# Altium PCB CarnLog-26.PcbDoc (part 1 of 4)
Units mm, origin at the board's own origin, x right, y up, seen from the top; angles counter-clockwise.
Board outline 109.83 x 61.93 mm, 6 copper layers (Sig/Pwr/Gnd-1, Gnd-2, Sig/Pwr/Gnd-3, Sig/Pwr/Gnd-4, Gnd-5, Sig/Pwr-6), stack 1.491 mm thick; 183 components, 128 nets, 802 pads, 490 vias.
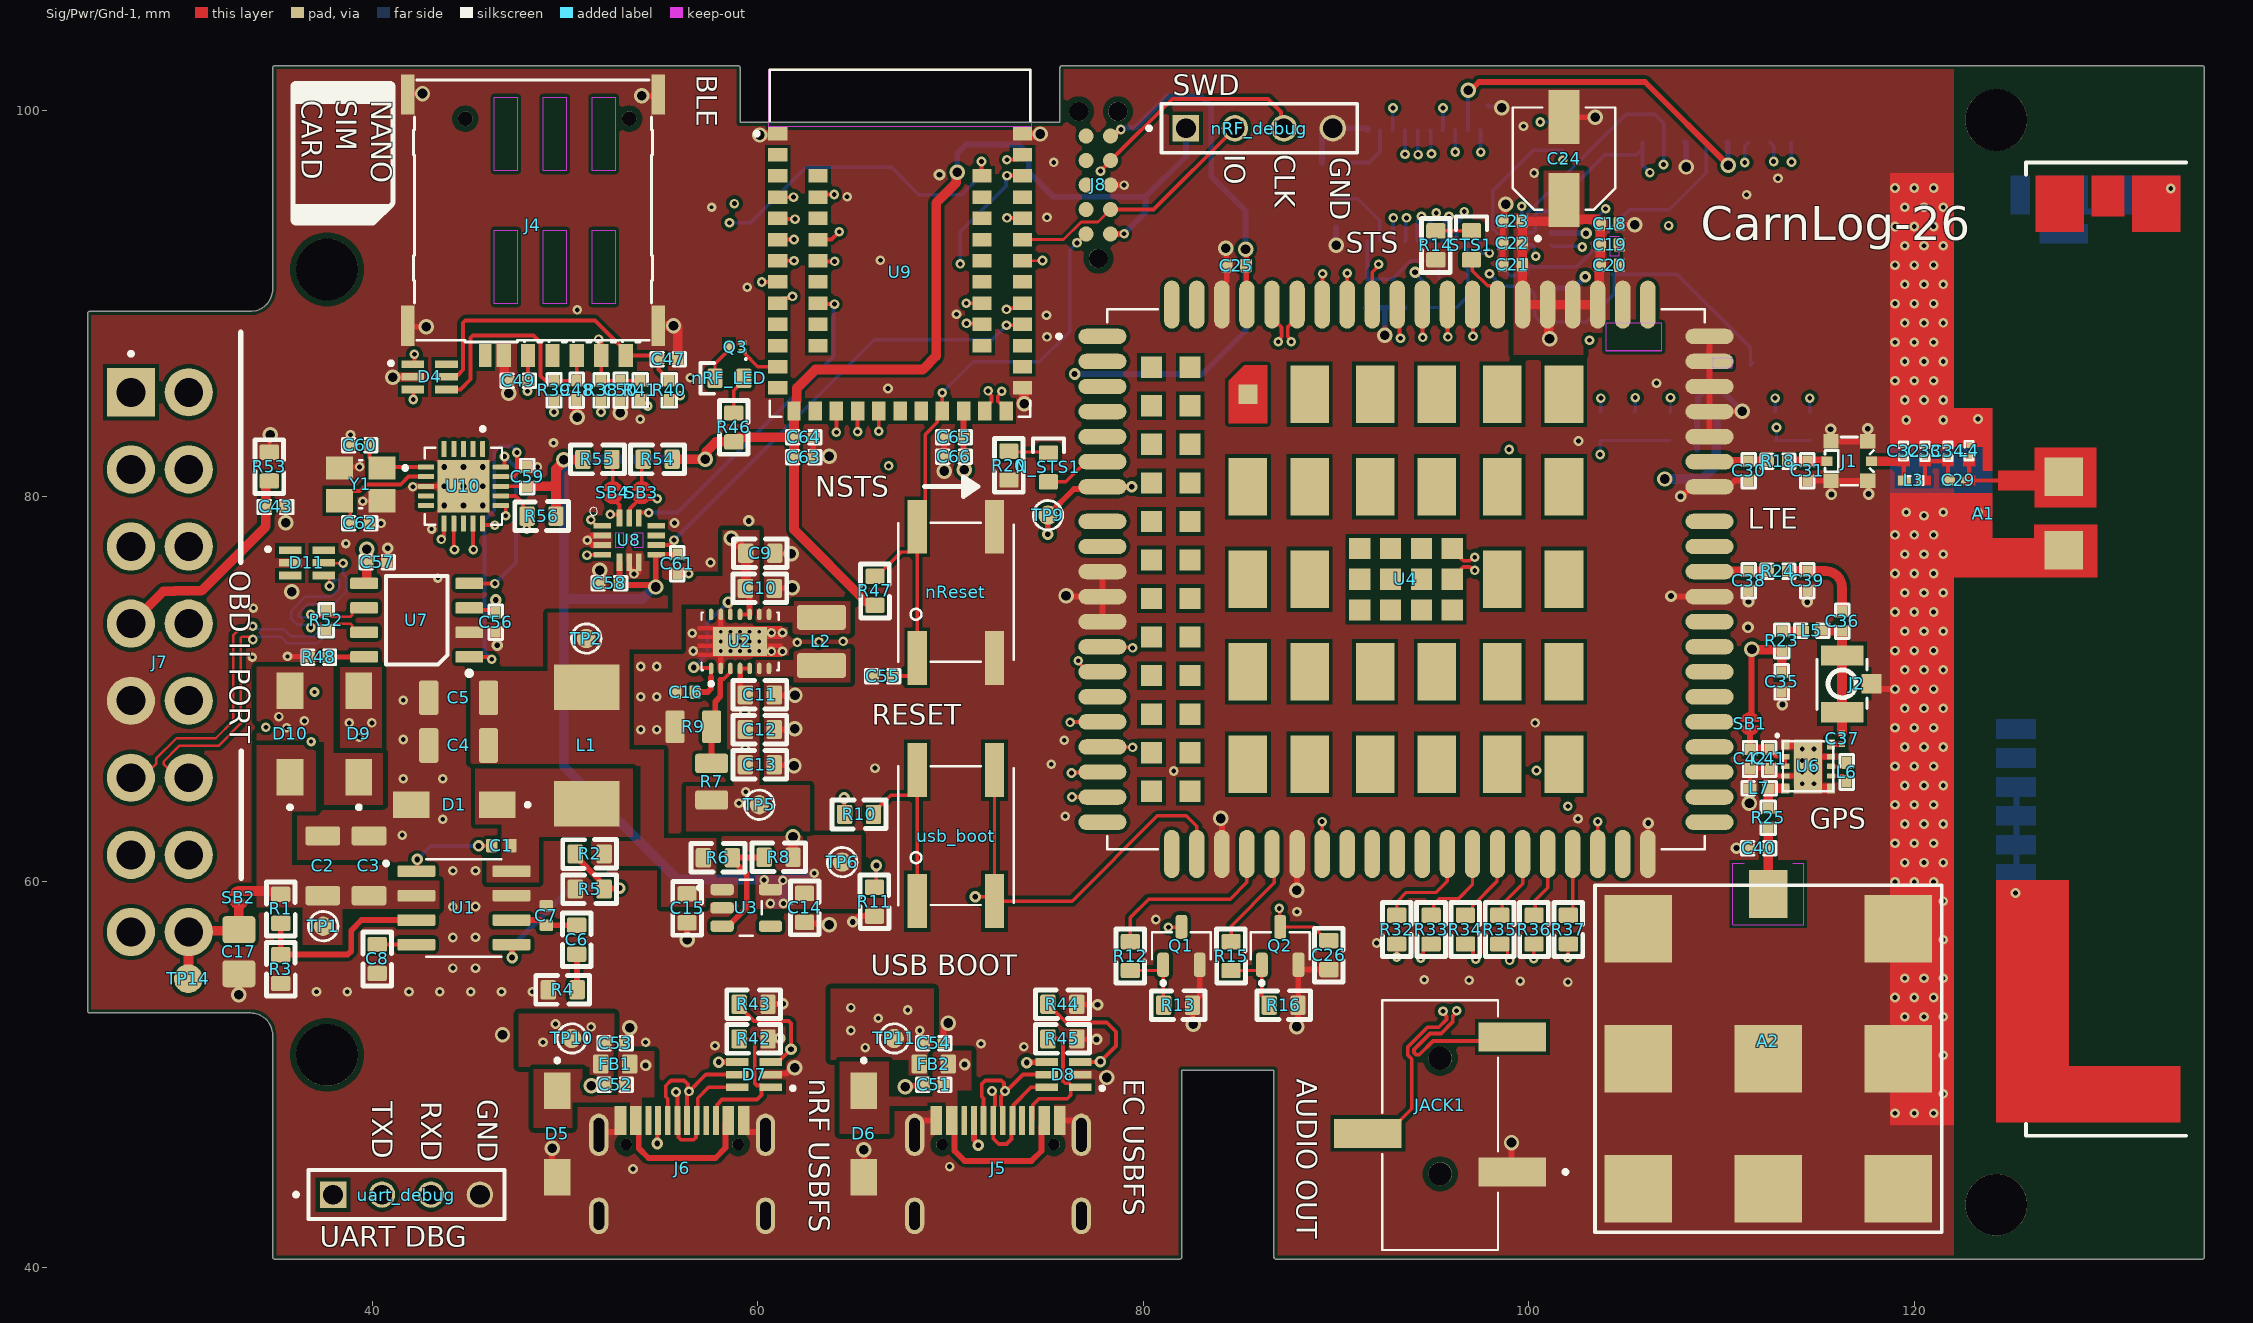
[diagram p0: Sig/Pwr/Gnd-1 view]
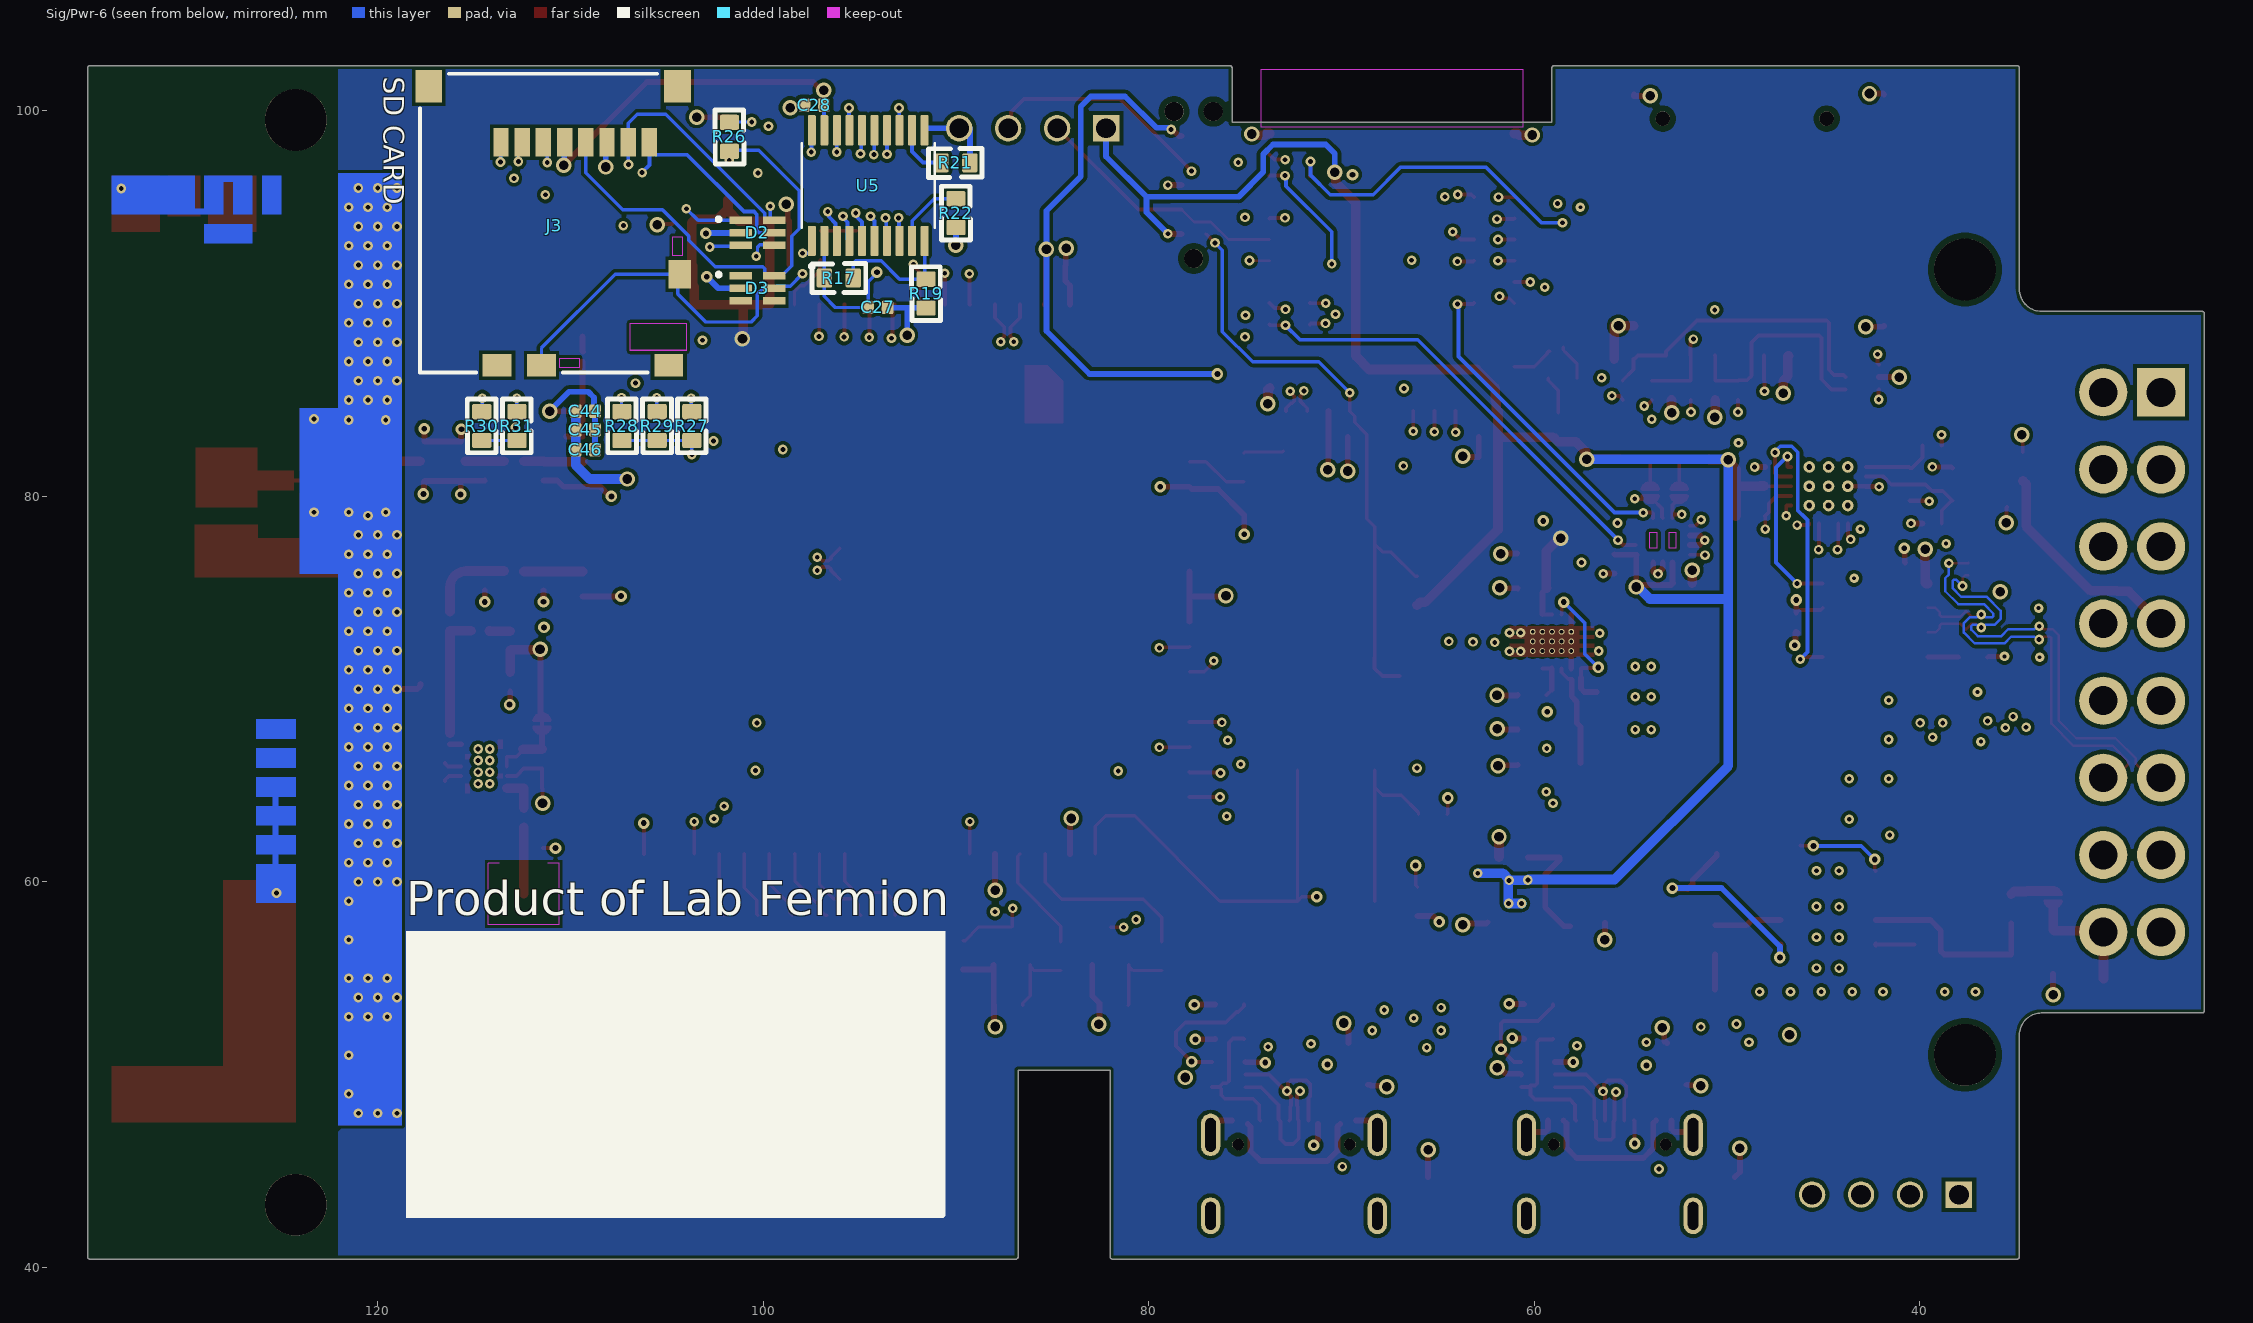
[diagram p1: Sig/Pwr-6 view, seen from below]
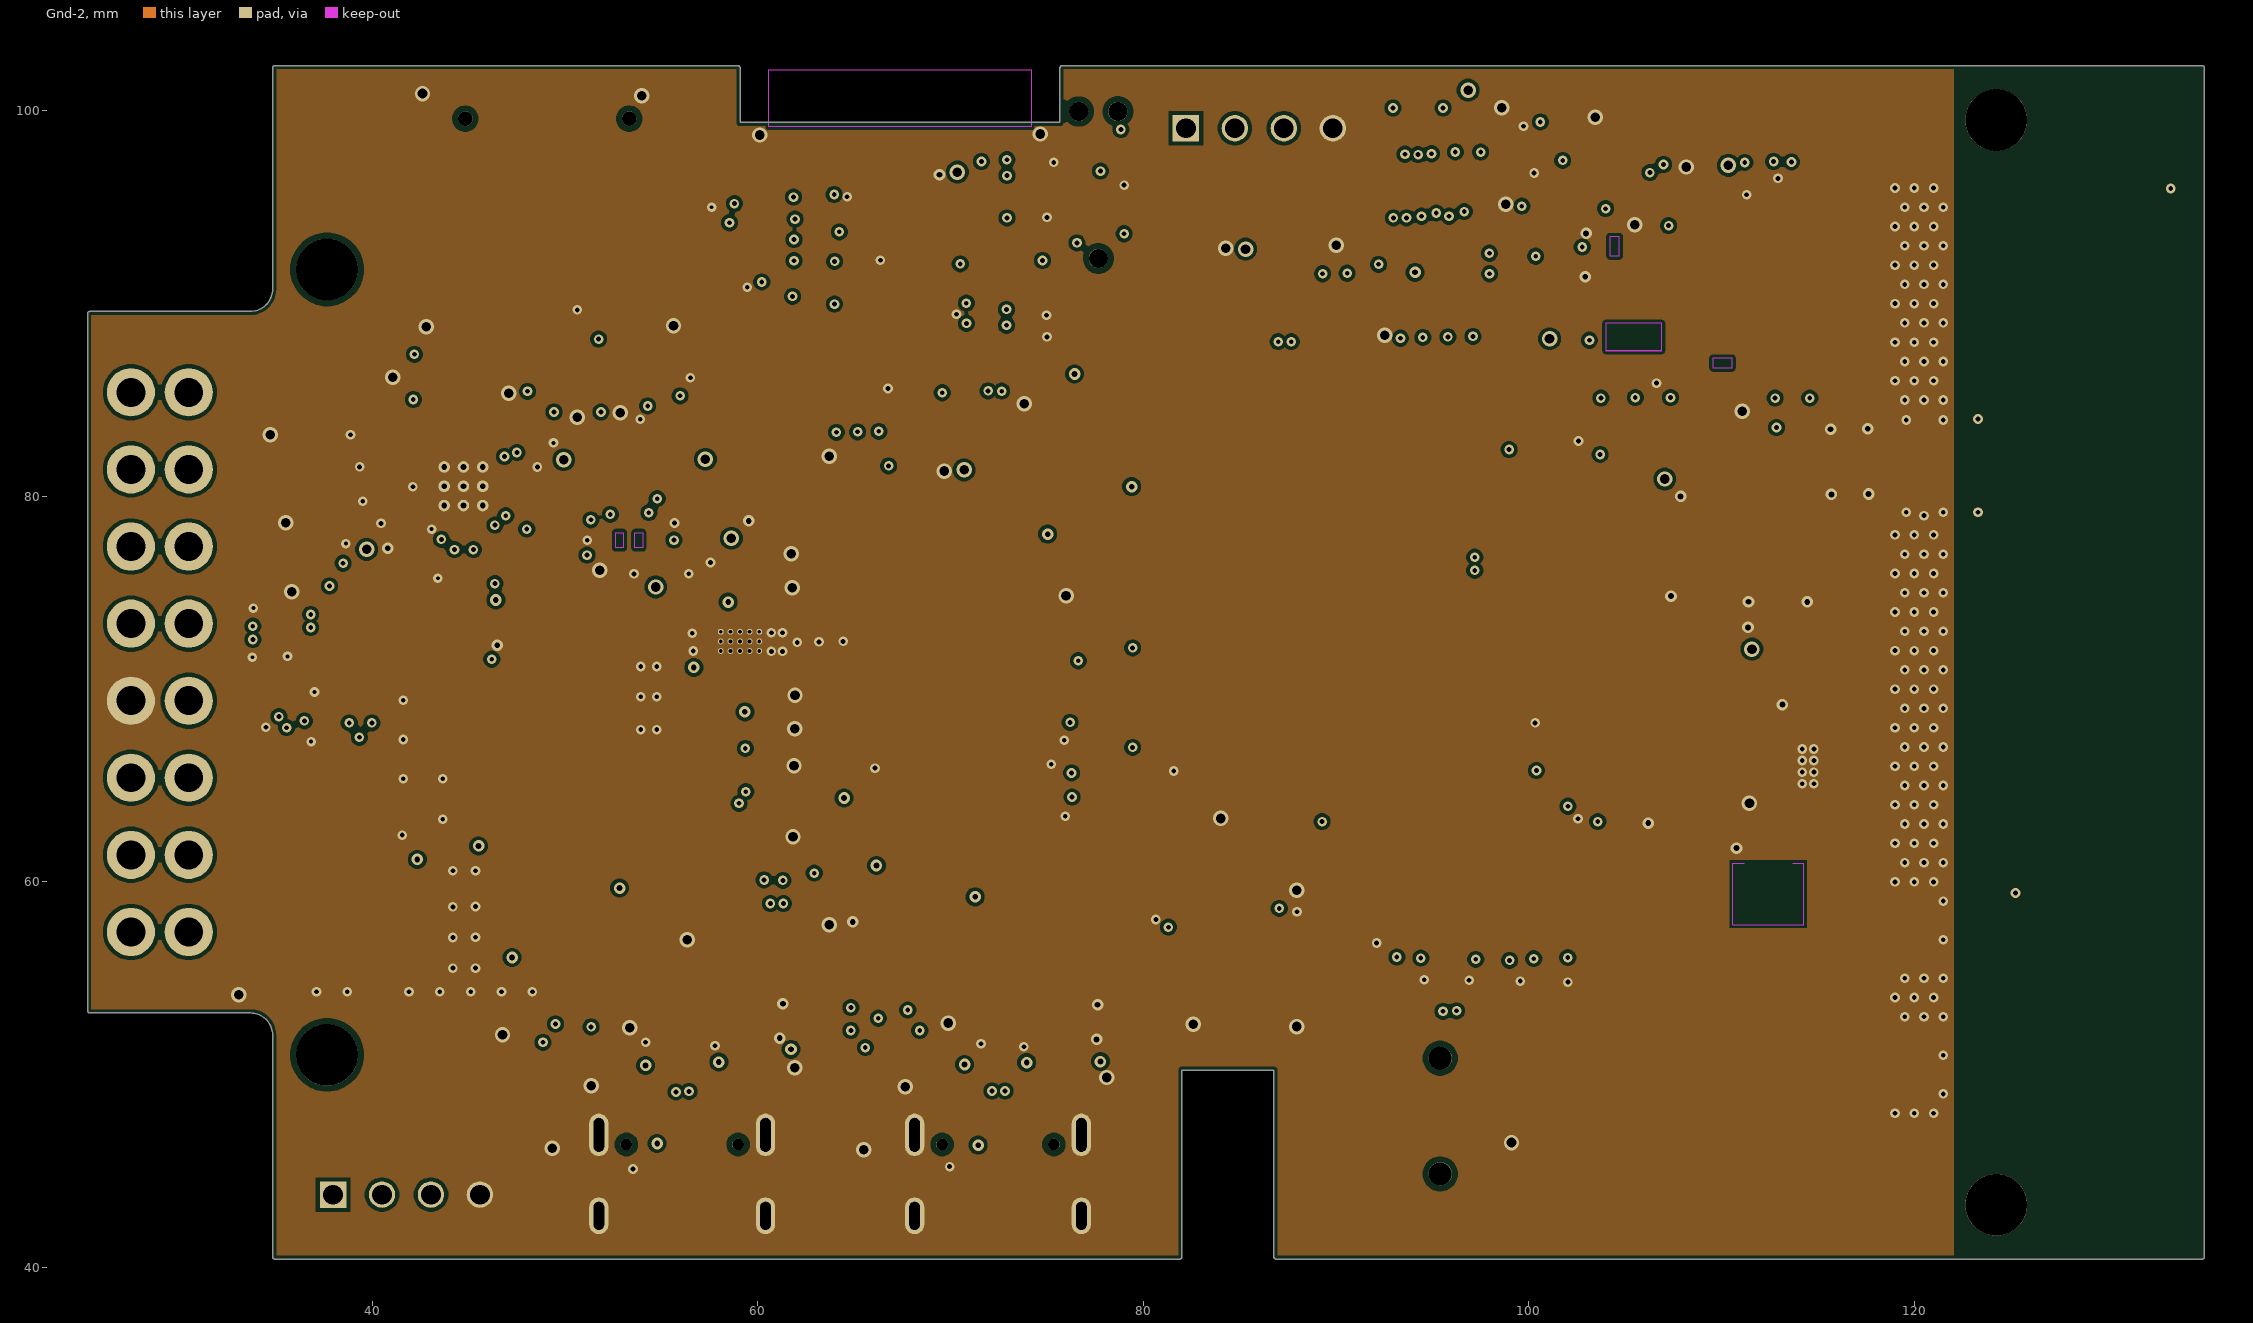
[diagram p2: Gnd-2]
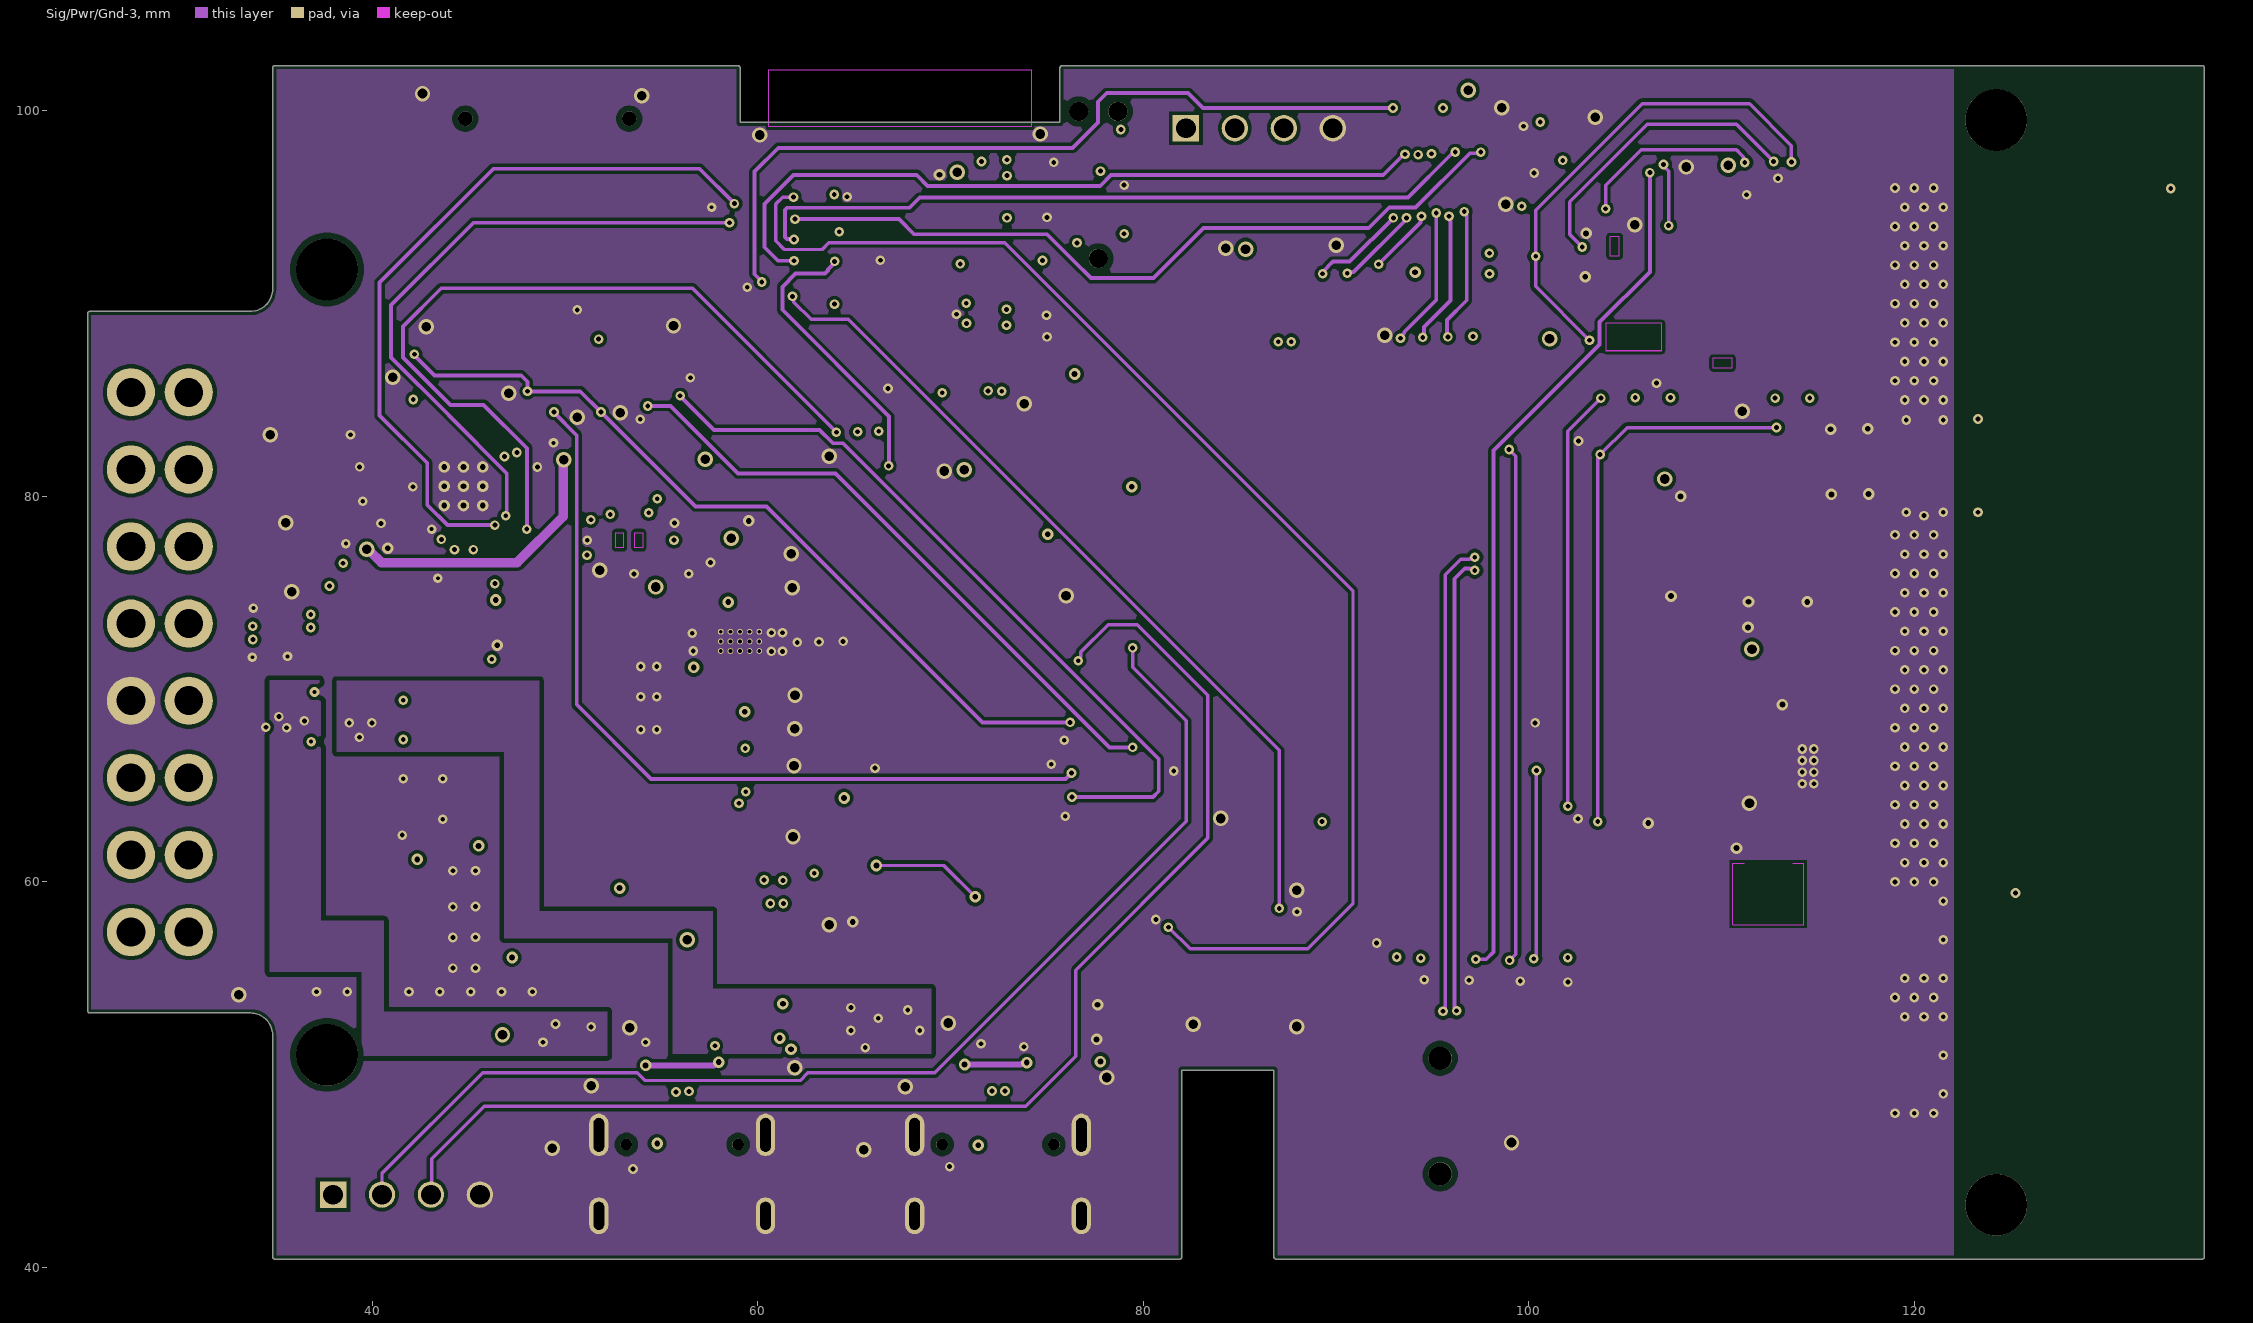
[diagram p3: Sig/Pwr/Gnd-3]
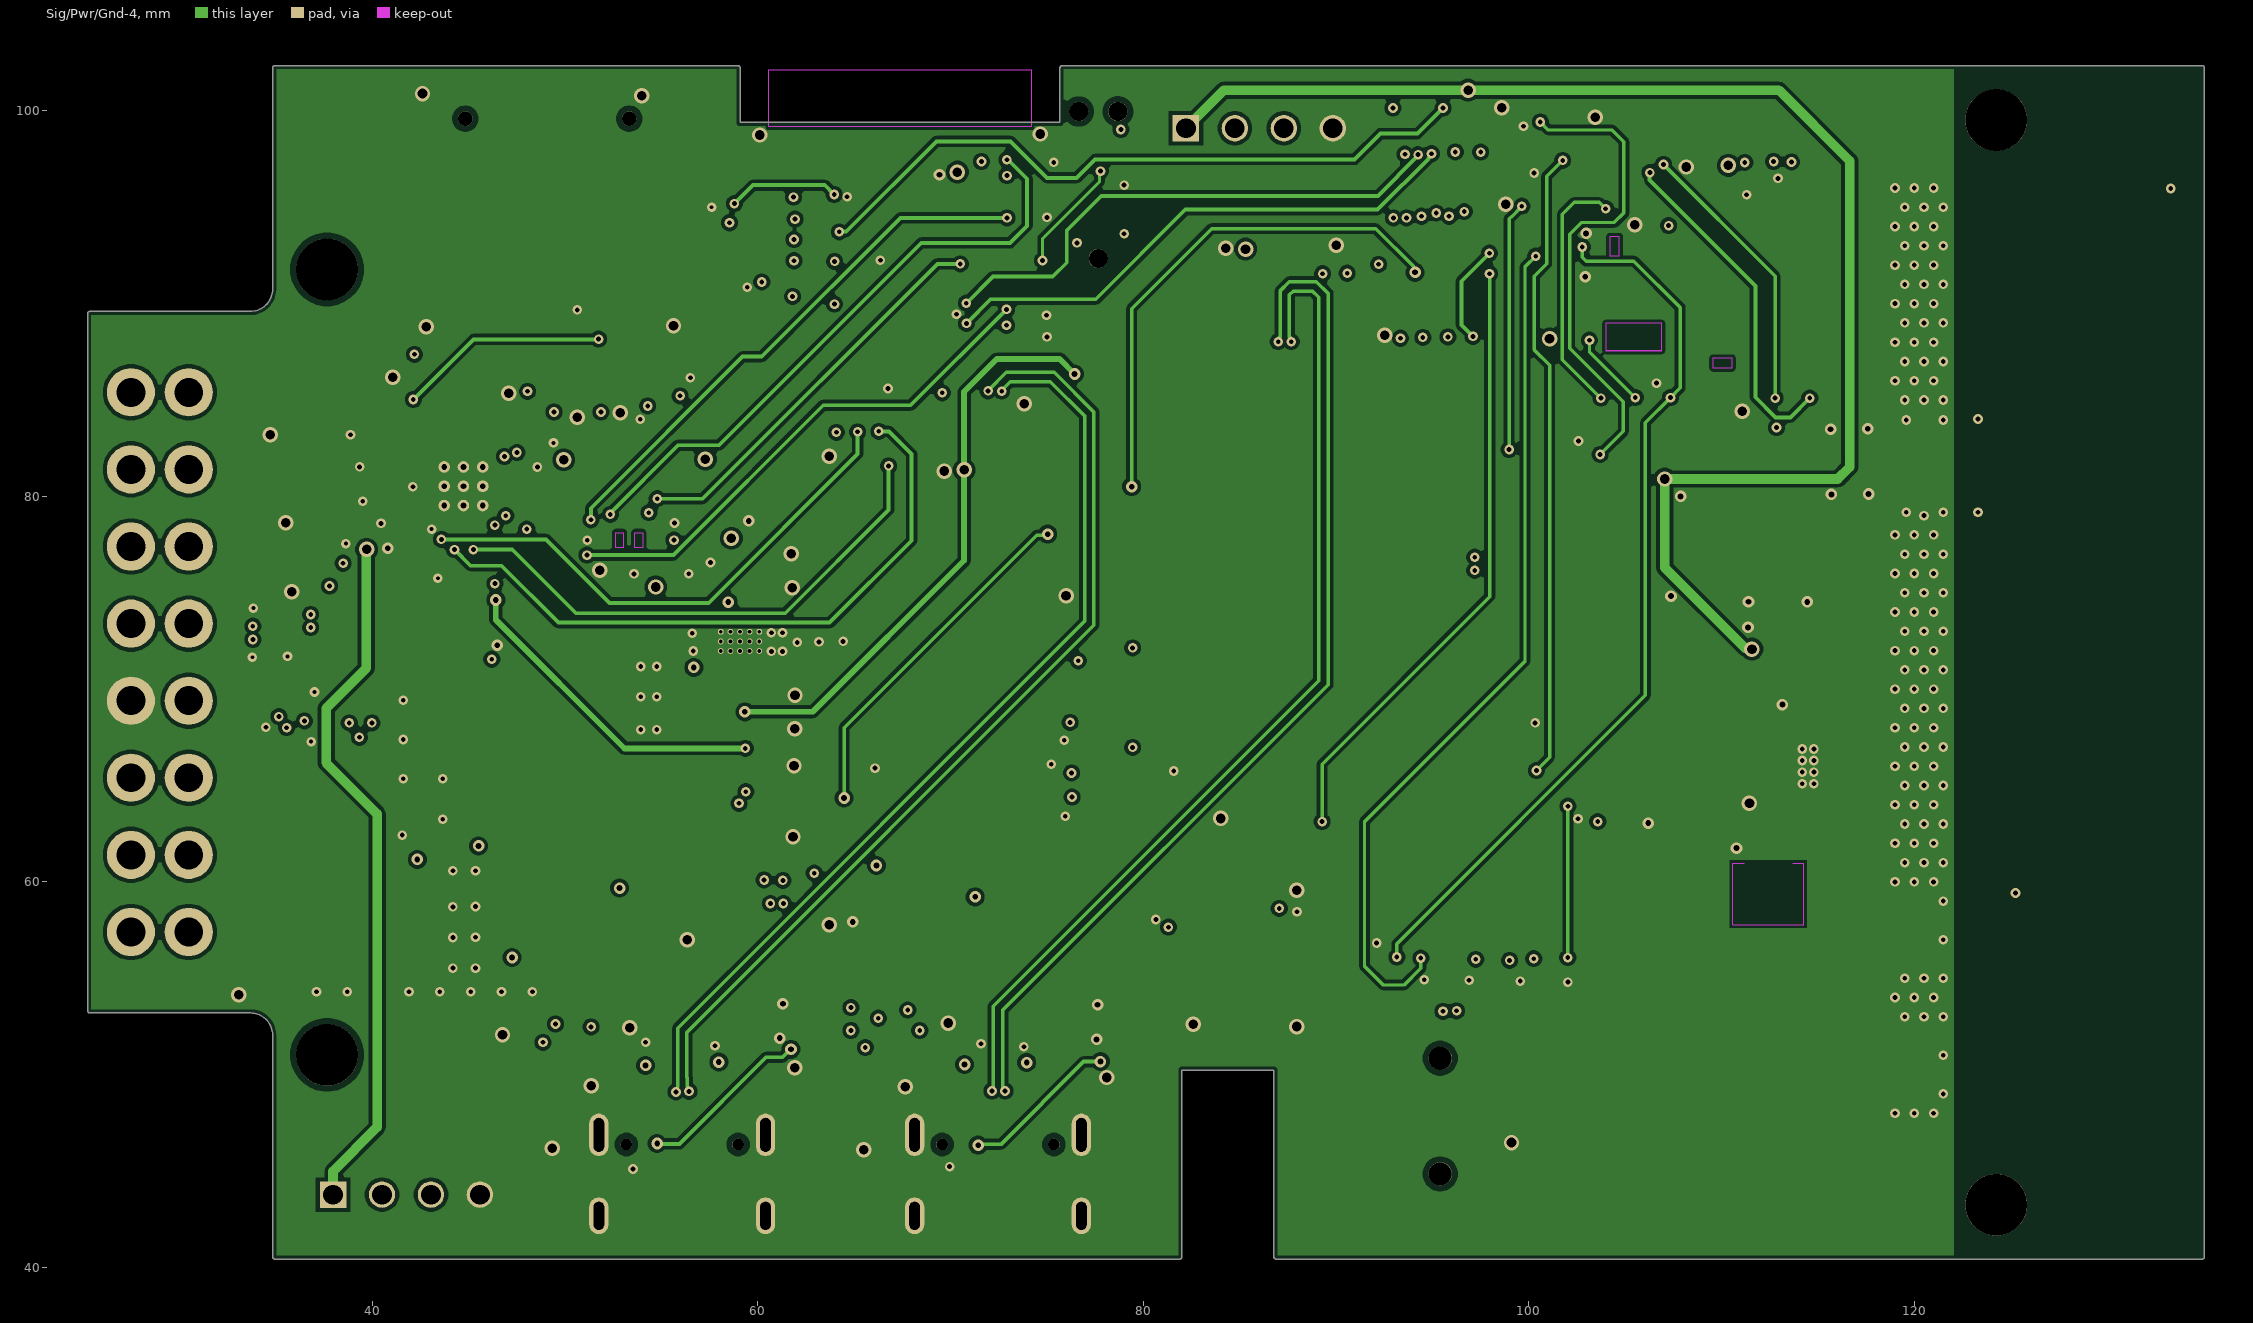
[diagram p4: Sig/Pwr/Gnd-4]
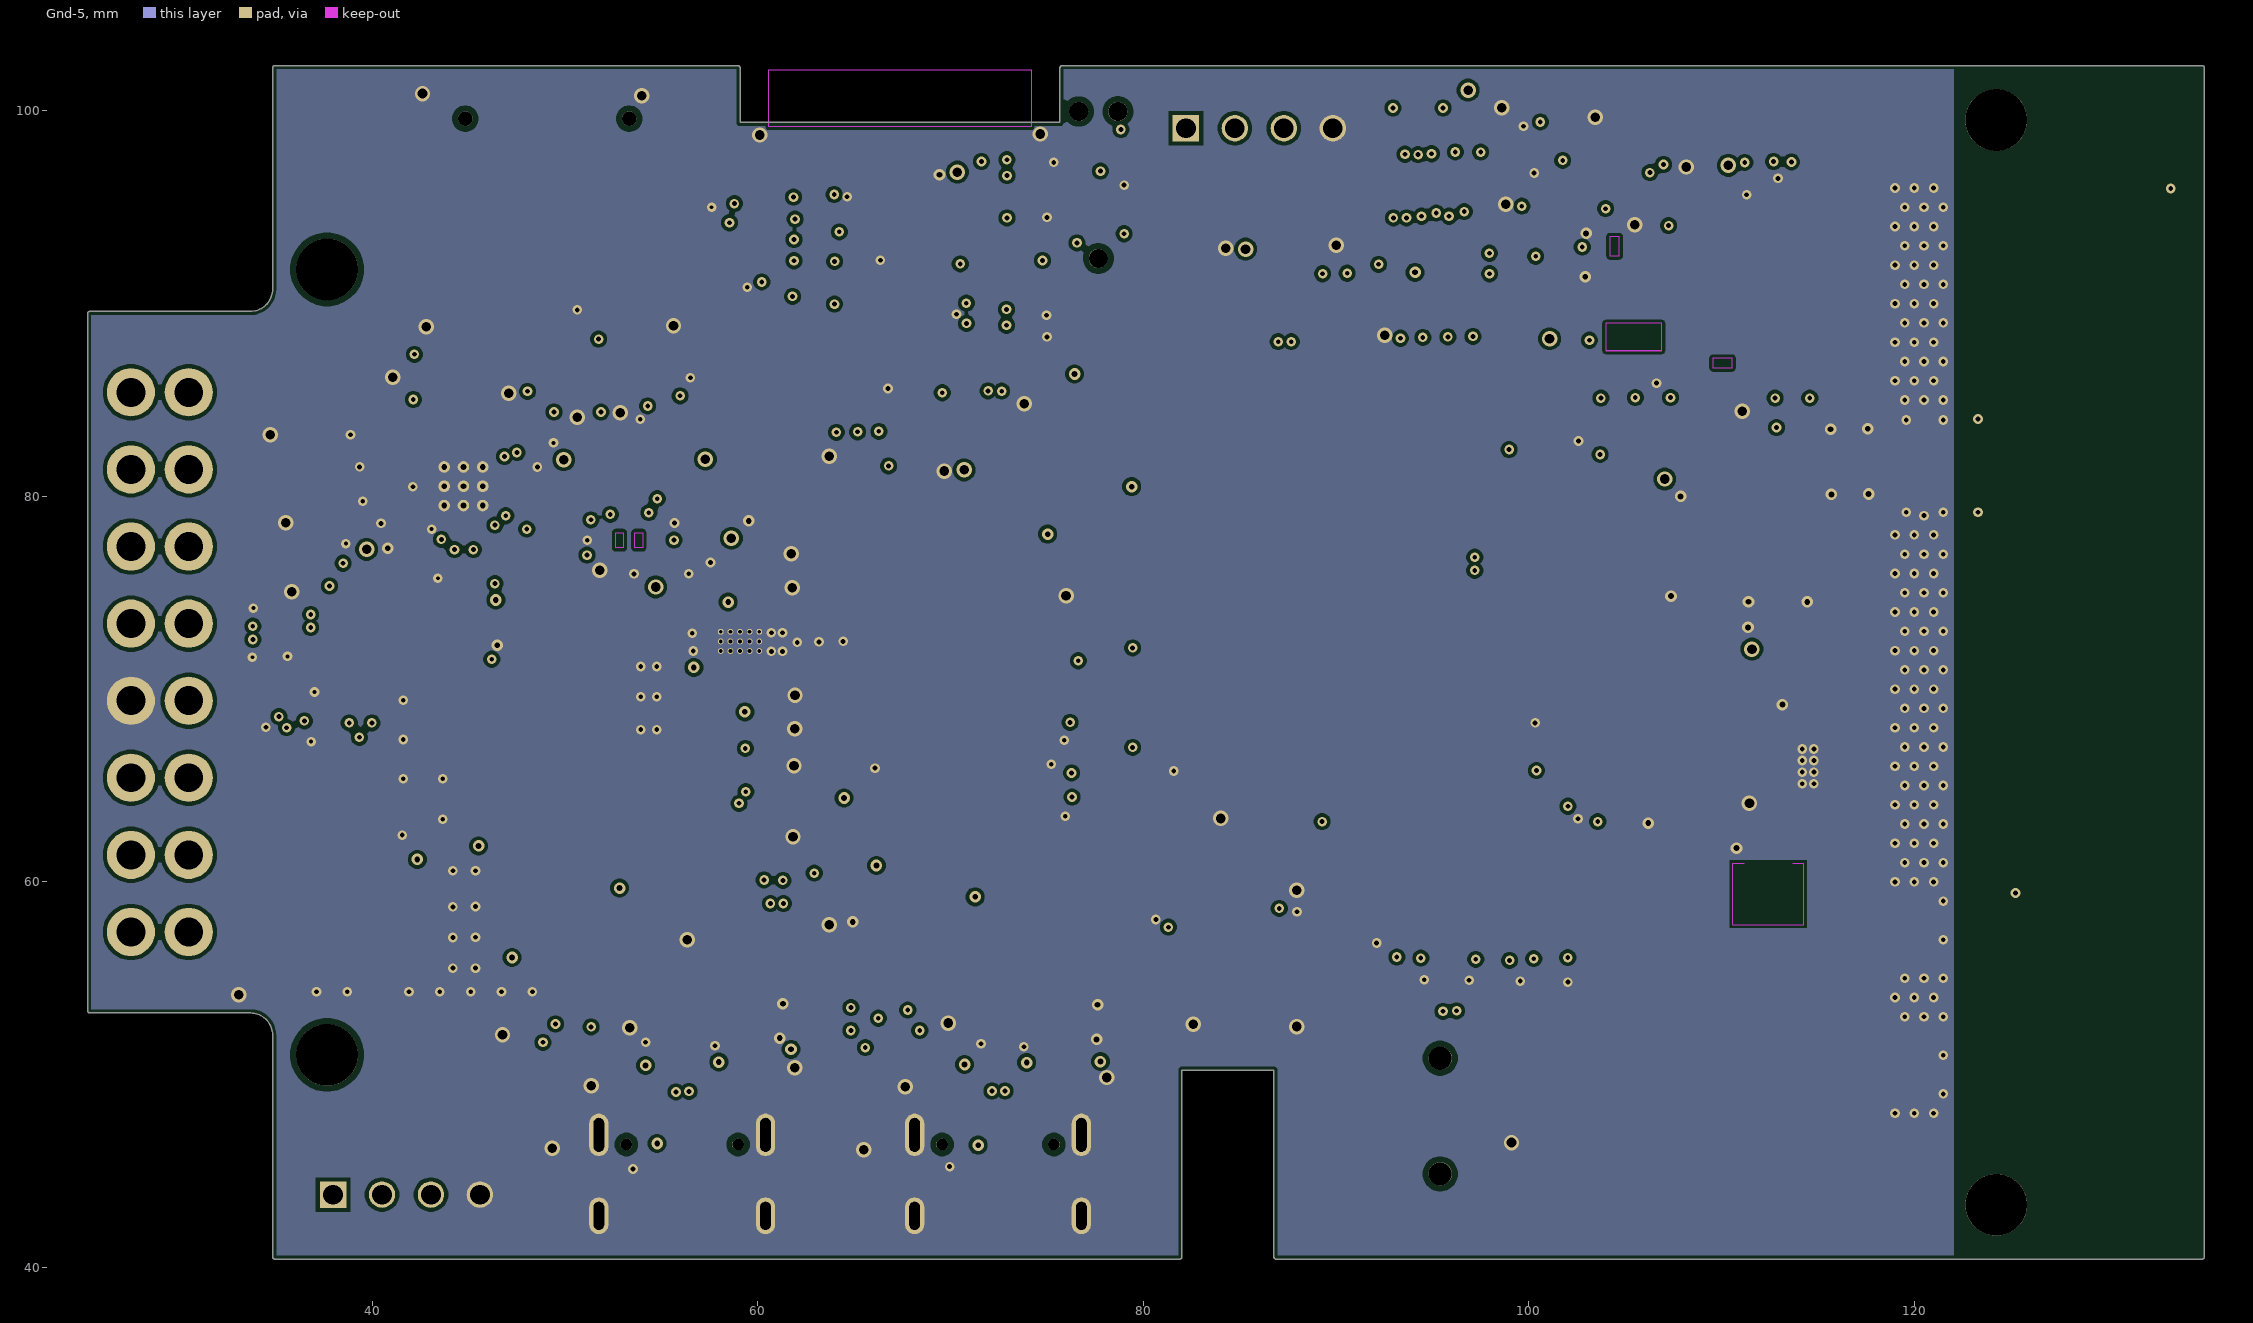
[diagram p5: Gnd-5]
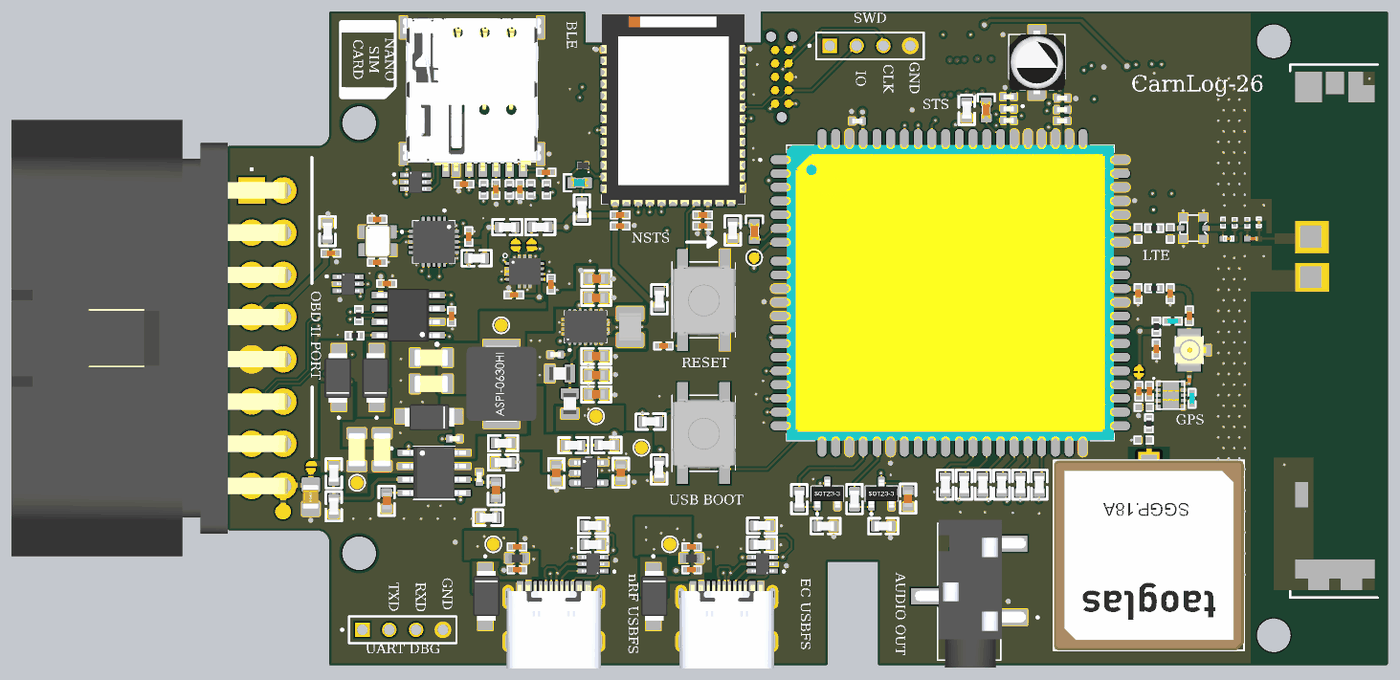
[diagram p8: 3D render of the assembled board from above, using the file's embedded part models]
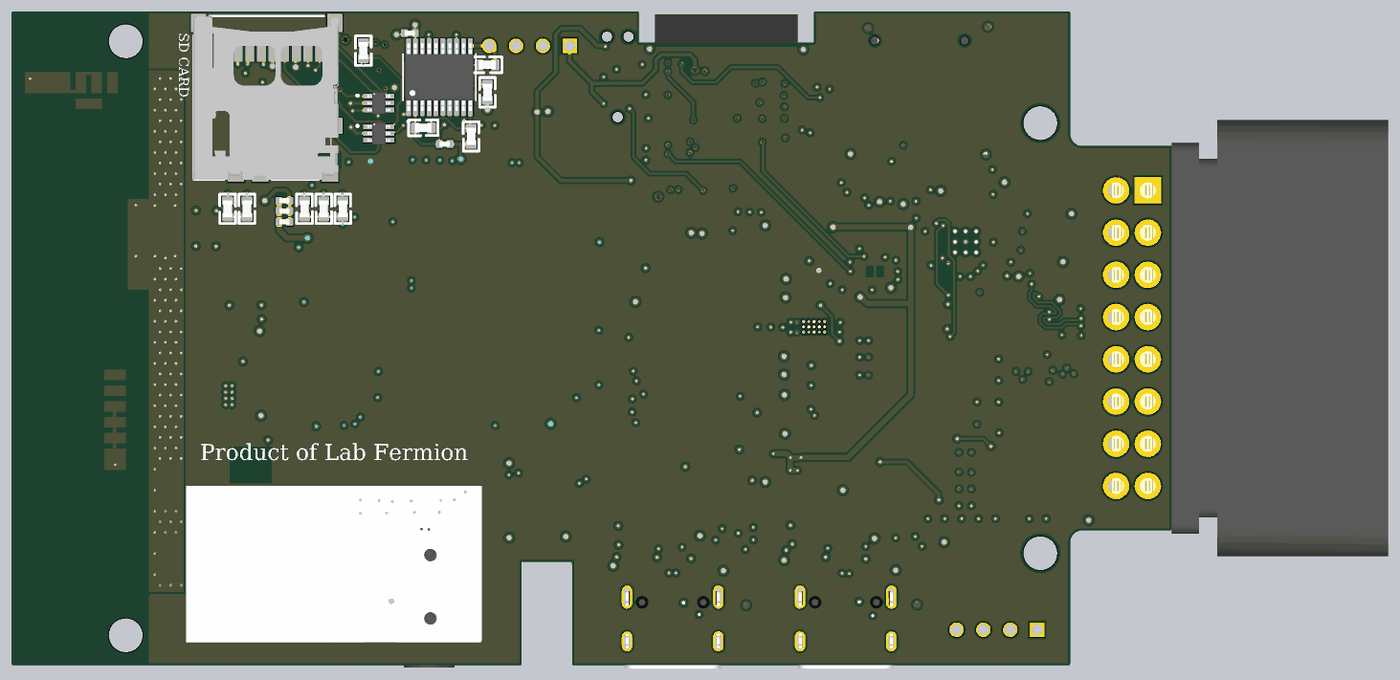
[diagram p9: 3D render of the assembled board from below, using the file's embedded part models]

## Layer stack, top to bottom
Top Solder: solder mask 0.0102, Solder Resist, Dk 3.5
Sig/Pwr/Gnd-1: signal copper 0.0175
Dielectric 2: prepreg 0.13, PP-006, Dk 4.45
Gnd-2: signal copper 0.035
Dielectric 4: core 0.43, PP-006, Dk 4.6
Sig/Pwr/Gnd-3: signal copper 0.035
Dielectric 1: prepreg 0.196, PP-006, Dk 4.74
Sig/Pwr/Gnd-4: signal copper 0.035
Dielectric 5: core 0.43, PP-006, Dk 4.6
Gnd-5: signal copper 0.035
Dielectric 3: prepreg 0.13, PP-006, Dk 4.45
Sig/Pwr-6: signal copper 0.0175
Board Layer Stack Bottom Solder: solder mask 0.0102, Solder Resist, Dk 3.5

## Board outline
34.823,40.549 34.823,52.055 ccw(c33.68,52.055) 33.68,53.198 25.35,53.198 cw(c25.35,53.325) 25.223,53.325 25.223,89.475 cw(c25.35,89.475) 25.35,89.602 33.68,89.602 ccw(c33.68,90.745) 34.823,90.745 34.823,102.225 cw(c34.95,102.225) 34.95,102.352 58.95,102.352 cw(c58.95,102.225) 59.077,102.225 59.077,99.402 75.673,99.402 75.673,102.225 cw(c75.8,102.225) 75.8,102.352 134.925,102.352 cw(c134.925,102.225) 135.052,102.225 135.052,40.549 cw(c134.925,40.549) 134.925,40.422 86.9,40.422 cw(c86.9,40.549) 86.773,40.549 86.773,50.223 82.002,50.223 82.002,40.549 cw(c81.875,40.549) 81.875,40.422 34.95,40.422 cw(c34.95,40.549)

## Design rules (kind name [scope] priority, off if disabled: settings)
BoardOutlineClearance [All] p1: gap=0.2 ignorepadtopadclearanceinfootprint=FALSE except(0: Arc-SplitContinuation Track-SplitContinuation SMDPad-SplitContinuation THPad-SplitContinuation Via-SplitContinuation Fill-SplitContinuation Poly-SplitContinuation Region-SplitContinuation Text-SplitContinuation; 0.1: SMDPad-OutlineEdge)
Clearance "Default Clearance" [All] p1: gap=0.18 ignorepadtopadclearanceinfootprint=TRUE except(0.125: Arc-Arc Arc-Track Track-Track; 0.15: Arc-SMDPad Arc-Text Track-SMDPad Track-Text SMDPad-SMDPad SMDPad-Text THPad-Text Via-Text Fill-Text Poly-Text Region-Text Text-Text; 0.2: Arc-THPad Arc-Hole Track-THPad Track-Hole SMDPad-THPad SMDPad-Hole THPad-THPad THPad-Via THPad-Fill THPad-Poly THPad-Region THPad-Hole Via-Hole Fill-Hole Region-Hole Text-Hole; 0.25: Poly-Poly; 0.3: Poly-Hole)
DiffPairsRouting CAN [InDifferentialPair('CANH')] p1: maxlimit=1.2 minlimit=0.25 mostfreqgap=1.2 toplayer_maxgap=0.25 toplayer_prefgap=0.25 toplayer_minwidth=0.13 toplayer_maxwidth=0.13 toplayer_prefwidth=0.13 midlayer1_mingap=1.2 midlayer1_minwidth=0.112 midlayer1_maxwidth=0.112 midlayer1_prefwidth=0.112 midlayer2_mingap=1.2 midlayer2_minwidth=0.112 midlayer2_maxwidth=0.112 midlayer2_prefwidth=0.112 midlayer3_mingap=1.2 midlayer3_minwidth=0.077 midlayer3_maxwidth=0.077 midlayer3_prefwidth=0.077 midlayer4_mingap=1.2 midlayer4_minwidth=0.077 midlayer4_maxwidth=0.077 midlayer4_prefwidth=0.077 bottomlayer_maxgap=0.25 bottomlayer_prefgap=0.25 bottomlayer_minwidth=0.13 bottomlayer_maxwidth=0.13 bottomlayer_prefwidth=0.13 impedanceprofiledriven=TRUE impedanceprofileid={E55CDBC2-1989-4973-B641-19EF53B93880} impedanceprofilevalue=120.000000 maxuncoupledlength=12.7
DiffPairsRouting USB [All] p2: maxlimit=0.3 minlimit=0.127 mostfreqgap=0.3 toplayer_maxgap=0.127 toplayer_prefgap=0.127 toplayer_minwidth=0.194 toplayer_maxwidth=0.194 toplayer_prefwidth=0.194 midlayer1_mingap=0.3 midlayer1_minwidth=0.185 midlayer1_maxwidth=0.185 midlayer1_prefwidth=0.185 midlayer2_mingap=0.3 midlayer2_minwidth=0.185 midlayer2_maxwidth=0.185 midlayer2_prefwidth=0.185 midlayer3_mingap=0.25 midlayer3_maxgap=0.25 midlayer3_prefgap=0.25 midlayer3_minwidth=0.133 midlayer3_maxwidth=0.133 midlayer3_prefwidth=0.133 midlayer4_mingap=0.25 midlayer4_maxgap=0.25 midlayer4_prefgap=0.25 midlayer4_minwidth=0.133 midlayer4_maxwidth=0.133 midlayer4_prefwidth=0.133 bottomlayer_maxgap=0.127 bottomlayer_prefgap=0.127 bottomlayer_minwidth=0.194 bottomlayer_maxwidth=0.194 bottomlayer_prefwidth=0.194 impedanceprofiledriven=TRUE impedanceprofileid={9AA853E6-995D-4593-831A-1A9165D126B1} impedanceprofilevalue=90.000000 maxuncoupledlength=12.7
PasteMaskExpansion [All] p1: expansion=0.02
PlaneClearance [All] p1: clearance=0.5
PlaneConnect [All] p1: planeconnectstyle=Direct reliefexpansion=0.508 reliefentries=4 reliefconductorwidth=0.254 reliefairgap=0.254
PolygonConnect [All] p1: connectstyle=Direct reliefconductorwidth=0.254 reliefentries=4 polygonreliefangle="90 Angle" airgapwidth=0.254
RoutingVias [All] p1: holewidth=0.25 width=0.5 viastyle="Through Hole" minholewidth=0.2 minwidth=0.5 maxholewidth=0.7 maxwidth=1
SolderMaskExpansion [All] p1: expansion=0.1 istentingtop=FALSE
SupplyNets "Schematic Supply Nets" [InNet('C_GND')] p1: voltage=0.000
SupplyNets "Schematic Supply Nets_8" [InNet('+VIN')] p2: voltage=0.000
SupplyNets "Schematic Supply Nets_7" [InNet('EC_VUSB')] p3: voltage=0.000
SupplyNets "Schematic Supply Nets_6" [InNet('nRF_VUSB')] p4: voltage=0.000
SupplyNets "Schematic Supply Nets_5" [InNet('GND')] p5: voltage=0.000
SupplyNets "Schematic Supply Nets_4" [InNet('+VOBD2')] p6: voltage=0.000
SupplyNets "Schematic Supply Nets_3" [InNet('+4V')] p7: voltage=0.000
SupplyNets "Schematic Supply Nets_2" [InNet('+5V')] p8: voltage=0.000
SupplyNets "Schematic Supply Nets_1" [InNet('+3V3')] p9: voltage=0.000
Width "Schematic Width Constraint" [InNet('GND')] p1: maxlimit=0.5 minlimit=0.2 preferedwidth=0.5 minimp=50.000000 maximp=50.000000 favimp=50.000000
Width [All] p2: maxlimit=1 minlimit=0.15 preferedwidth=0.2
26 further rules are at their usual default settings.

## Classes and differential pairs
net class GND: GND
net class LSM_SET: CS INT1 INT2 SCL SDA SDO/SAO
net class USB_EC: EC_USB_N EC_USB_P
net class SD_SET: SD_CLK SD_CMD SD_DAT0 SD_DAT1 SD_DAT2 SD_DAT3 SD_VDD
net class RF_SET: AG_CAP AG_CONN AG_IND AG_LNA_I AG_LNA_O AG_OUT AM_CAP AM_CONN AM_IND AM_OUT ANT_GNSS ANT_MAIN
net class nRF_USB: nRF_USB_N nRF_USB_P
net class EC_UART: MCU_CTS MCU_DCD MCU_DTR MCU_PWR MCU_RI MCU_RST MCU_RTS MCU_RXD MCU_TXD
net class CANBUS: CANH_N CANH_P
net class CAN_UART: CAN_RX CAN_TX
component class POWER: C1 C2 C3 C4 C5 C6 C7 C8 C9 C10 C11 C12 C13 C14 C15 C16 D1 L1 L2 R1 R2 R3 R4 R5 R6 R7 R8 R9 TP1 TP2 TP5 TP6 U1 U2 U3
component class nrf52840: C55 C58 C61 C63 C64 C65 C66 J8 nReset nRF_debug nRF_LED Q3 R46 R47 R54 R55 SB3 SB4 U8 U9
component class EC200U: A1 A2 C18 C19 C20 C21 C22 C23 C24 C25 C26 C27 C28 C29 C30 C31 C32 C33 C34 C35 C36 C37 C38 C39 C40 C41 C42 C44 C45 C46 C47 C48 C49 C50 D2 D3 D4 J1 J2 J3 J4 JACK1 L3 L4 L5 L6 L7 N_STS1 Q1 Q2 R10 R11 R12 R13 R14 R15 R16 R17 R18 R19 R20 R21 R22 R23 R24 R25 R26 R27 R28 R29 R30 R31 R32 R33 R34 R35 R36 R37 R38 R39 R40 R41 SB1 STS1 TP9 U4 U5 U6 uart_debug usb_boot
component class "can & usb": C17 C43 C51 C52 C53 C54 C56 C57 C59 C60 C62 D5 D6 D7 D8 D9 D10 D11 FB1 FB2 J5 J6 J7 R42 R43 R44 R45 R48 R52 R53 R56 SB2 TP10 TP11 TP14 U7 U10 Y1
differential pair nRF_USB: +nRF_USB_P -nRF_USB_N
differential pair LOUDSPK: +LOUDSPK_P -LOUDSPK_N
differential pair EC_USB: +EC_USB_P -EC_USB_N
differential pair CANH: +CANH_P -CANH_N

## Components (designator, comment, footprint, x,y, rotation, side; value= is the part's Value field where it differs from the comment)
A1 "P822601" P822601 130.046,72.125 r270 top locked
A2 "DSGP.1575.18" DSGP.1575.18.4.C.02 112.425,50.825 r180 top locked
C1 "100n 50V" CAP_0402 46.687,61.885 r180 top
C2 "10u 50V" CAP_1206 37.425,60.835 r270 top
C3 "10u 50V" CAP_1206 39.825,60.835 r270 top
C4 "47u 25V" CAP_1206 44.475,67.075 r0 top
C5 "47u 25V" CAP_1206 44.475,69.55 r0 top
C6 "1n 50V" CAP_0603 50.6,57 r90 top
C7 "10p 50V" CAP_0402 49.025,58.25 r270 top
C8 "10n 50V" CAP_0603 40.25,56 r90 top
C9 "22u 16V" CAP_0603 60.125,77.05 r180 top
C10 "22u 16V" CAP_0603 60.1,75.225 r180 top
C11 "10u 25V" CAP_0603 60.1,69.7 r180 top
C12 "10u 25V" CAP_0603 60.1,67.9 r180 top
C13 "10u 25V" CAP_0603 60.1,66.075 r180 top
C14 "1uF 50V" CAP_0603 62.425,58.65 r90 top
C15 "1uF 50V" CAP_0603 56.325,58.625 r90 top
C16 "100n 50V" CAP_0402 56.25,69.85 r0 top
C17 "100n 50V" CAP_0805 33.075,56.375 r90 top
C18 "100n 50V" CAP_0402 104.2,94.15 r180 top
C19 "33p" CAP_0402 104.2,93.05 r180 top
C20 "10p" CAP_0402 104.2,92 r180 top
C21 "10p" CAP_0402 99.15,92.025 r0 top
C22 "33p" CAP_0402 99.15,93.125 r0 top
C23 "100n 50V" CAP_0402 99.15,94.275 r0 top
C24 "100u 6v3" CAP_EEEHA0J101WR 101.825,97.525 r90 top
C25 "100n 50V" CAP_0402 84.825,91.975 r180 top
C26 "10n 50V" CAP_0603 89.625,56.2 r90 top
C27 "100n 50V" CAP_0402 94.05,89.8 r180 bottom
C28 "100n 50V" CAP_0402 97.35,100.3 r180 bottom
C29 "3p5" CAPC0603X03L_C 122.271,80.825 r0 top value=3.5pF
C30 "N.C." CAPC1005X04L_NC 111.4,81.325 r90 top
C31 "N.C." CAPC1005X04L_NC 114.45,81.325 r90 top
C32 "N.C." CAPC0603X03L_C_NC 119.446,82.35 r270 top
C33 "N.C." CAPC0603X03L_C_NC 120.546,82.34 r270 top
C34 "N.C." CAPC0603X03L_C_NC 121.746,82.34 r270 top
C35 "100n" CAPC1005X04L 113.125,70.375 r90 top value=4.7µF
C36 "100p" CAPC1005X04L 116.25,73.525 r90 top value=4.7µF
C37 "39p" CAPC0603X03L_C 116.25,67.425 r270 top value=39pF
C38 "NM" CAPC1005X04L 111.4,75.625 r90 top value=4.7µF
C39 "NM" CAPC1005X04L 114.45,75.625 r90 top value=4.7µF
C40 "N.C." CAPC1005X04L_NC 111.925,61.75 r0 top
C41 "100n" CAPC1005X04L 112.475,66.375 r90 top value=4.7µF
C42 "100p" CAPC1005X04L 111.475,66.375 r90 top value=4.7µF
C43 "100n 50V" CAPC1005X04L 34.975,79.45 r180 top value=4.7µF
C44 "10p" CAP_0402 109.225,84.425 r0 bottom
C45 "33p" CAP_0402 109.225,83.45 r0 bottom
C46 "100n 50V" CAP_0402 109.225,82.425 r0 bottom
C47 "33p" CAPC1005X04L 55.35,87.125 r180 top value=4.7µF
C48 "33p" CAPC1005X04L 50.6,85.5 r90 top value=4.7µF
C49 "100n 50V" CAPC1005X04L 47.575,86 r0 top value=4.7µF
C50 "33p" CAPC1005X04L 52.875,85.5 r90 top value=4.7µF
C51 "100n 50V" CAPC1005X04L 69.125,49.475 r180 top value=4.7µF
C52 "100n 50V" CAPC1005X04L 52.6,49.475 r180 top value=4.7µF
C53 "100n 50V" CAPC1005X04L 52.6,51.625 r0 top value=4.7µF
C54 "100n 50V" CAPC1005X04L 69.125,51.625 r0 top value=4.7µF
C55 "100n 50V" CAPC1005X04L 66.475,70.675 r0 top value=4.7µF
C56 "100n 50V" CAPC1005X04L 46.4,73.475 r270 top value=4.7µF
C57 "100n 50V" CAPC1005X04L 40.25,76.575 r180 top value=4.7µF
C58 "100n 50V" CAPC1005X04L 52.3,75.5 r0 top value=4.7µF
C59 "100n 50V" CAPC1005X04L 48.025,81.025 r270 top value=4.7µF
C60 "18p" CAPC1005X04L 39.35,82.65 r0 top value=4.7µF
C61 "100n 50V" CAPC1005X04L 55.825,76.5 r270 top value=4.7µF
C62 "18p" CAPC1005X04L 39.35,78.6 r180 top value=4.7µF
C63 "100n 50V" CAPC1005X04L 62.375,82.025 r180 top value=4.7µF
C64 "4u7 10V" CAPC1005X04L 62.375,83.075 r180 top value=4.7µF
C65 "100n 50V" CAPC1005X04L 70.175,83.075 r0 top value=4.7µF
C66 "10u 10V" CAPC1005X04L 70.175,82.05 r0 top value=4.7µF
D1 "SS54F" DIOM5226X100N 44.25,64 r180 top
D2 "SMF24CT1G" SOT65P210X110-6N 100.295,93.675 r180 bottom
D3 "SMF24CT1G" SOT65P210X110-6N 100.295,90.8 r180 bottom
D4 "SMF24CT1G" SOT65P210X110-6N 42.975,86.2 r0 top
D5 "SS54F" DIOM5226X100N 49.588,46.925 r270 top
D6 "SS54F" DIOM5226X100N 65.5,46.925 r270 top
D7 "SMF24CT1G" SOT65P210X110-6N 59.8,50 r180 top
D8 "SMF24CT1G" SOT65P210X110-6N 75.85,50 r180 top
D9 "SS54F" DIOM5226X100N 39.3,67.675 r90 top
D10 "SS54F" DIOM5226X100N 35.728,67.675 r90 top
D11 "SMF24CT1G" SOT65P210X110-6N 36.598,76.55 r0 top
FB1 "BLM18AG601SN1D" FB_0603 52.6,50.55 r0 top
FB2 "BLM18AG601SN1D" FB_0603 69.125,50.55 r0 top
J1 "MM8130-2600" COAXIAL-SWF 116.625,81.825 r270 top
J2 "MHF I Receptacle" "COAXIAL RF U.FL-R-SMT-1" 116.25,70.275 r90 top
J3 "5025700893" MOLEX_5025700893 110.9,94.175 r180 bottom
J4 "KLS1-SIM-066" KLS1-SIM-066 53.155,87.3 r180 top locked
J5 "TYPE-C-31-M-12" TYPE-C-31-M-12 72.459,44.775 r0 top locked
J6 "TYPE-C-31-M-12" TYPE-C-31-M-12 56.075,44.775 r0 top locked
J7 "C-OBD-II-16M" COMTECH_C-OBD-II-16M 27.475,85.4 r270 top locked
J8 "TC2050-IDC" TC2050-IDC-NLFP 77.665,96.155 r90 top
JACK1 "PJ-320B" BOOMELE_PJ-320B 95.4,47.85 r90 top
L1 "6u8" ASPI-0630HI-6R8M-T15 51.125,67.075 r90 top
L2 "1u5" IND_1008 63.3,72.475 r270 top
L3 "1n5" INDC0603X03L_C 119.975,80.825 r0 top value=1.5nH
L4 "22n" INDC0603X03L_C 122.846,82.365 r90 top value=22nH
L5 "68n" INDC1005X04L_WW 114.675,73.025 r180 top value=68nH
L6 "9n1" INDC1005X04L_WW 116.5,65.7 r90 top value=9.1nH
L7 "N.C." INDC1005X04L_NC 111.95,64.85 r0 top
N_STS1 "RED" LED_0603_RED 75.075,81.5 r270 top
nReset "EVQQ2W03W" EVQQ2W03W 70.275,75.025 r0 top
nRF_debug "TSW-104-08-T-S-LL" SAMTEC_TSW-104-08-T-S-LL 82.21,99.1 r0 top
nRF_LED "BLUE" LED_0603_BLUE 58.525,86.125 r0 top
Q1 "MMBT3904-7-F" SOT95P230X110-3N 81.975,56.68 r90 top
Q2 "MMBT3904-7-F" SOT95P230X110-3N 87.1,56.68 r90 top
Q3 "RV2C010UNT2L" DFN65P100X40-3L 58.85,87.75 r180 top
R1 "10k" RES_0603 35.25,58.6 r90 top
R2 "10k" RES_0603 51.275,61.45 r0 top
R3 "1M" RES_0603 35.25,55.475 r90 top
R4 "20k" RES_0603 49.875,54.4 r0 top
R5 "2k5" RES_0603 51.275,59.625 r0 top
R6 "1K" RES_0603 57.925,61.25 r180 top
R7 "1M6" RES_0805 57.6,65.2 r90 top
R8 "1K" RES_0603 61.075,61.275 r180 top
R9 "180K" RES_0805 56.65,68.05 r180 top
R10 "4k7" RES_0603 65.25,63.5 r0 top
R11 "4k7" RES_0603 66.05,58.975 r90 top
R12 "4k7" RES_0603 79.325,56.15 r270 top
R13 "47k" RES_0603 81.8,53.6 r180 top
R14 "1k" RES_0603 95.175,93.025 r90 top
R15 "4k7" RES_0603 84.55,56.15 r270 top
R16 "47k" RES_0603 87.275,53.6 r180 top
R17 "10k" RES_0603 96.075,91.325 r0 bottom
R18 "0R" RESC1005X04L 112.925,81.825 r0 top
R19 "120k" RES_0603 91.55,90.525 r90 bottom
R20 "1k" RES_0603 73.025,81.6 r270 top
R21 "51k" RES_0603 90.025,97.3 r180 bottom
R22 "51k" RES_0603 90,94.7 r90 bottom
R23 "0R" RESC1005X04L 113.125,72.5 r270 top
R24 "0R" RESC1005X04L 112.925,76.125 r180 top
R25 "0R" RESC1005X04L 112.425,63.325 r270 top
R26 "4k7" RES_0603 101.75,98.65 r90 bottom
R27 "4k7" RES_0603 103.7,83.65 r270 bottom
R28 "4k7" RES_0603 107.325,83.65 r270 bottom
R29 "4k7" RES_0603 105.5,83.65 r270 bottom
R30 "4k7" RES_0603 114.6,83.65 r270 bottom
R31 "4k7" RES_0603 112.775,83.65 r270 bottom
R32 "0R" RES_0603 93.15,57.525 r270 top
R33 "0R" RES_0603 94.93,57.525 r270 top
R34 "0R" RES_0603 96.71,57.525 r270 top
R35 "0R" RES_0603 98.49,57.525 r270 top
R36 "0R" RES_0603 100.271,57.525 r270 top
R37 "33R" RES_0603 102.051,57.525 r270 top
R38 "10k" RESC1005X04L 51.875,85.5 r270 top value=0R
R39 "0R" RESC1005X04L 49.425,85.5 r90 top
R40 "0R" RESC1005X04L 55.4,85.5 r90 top
R41 "0R" RESC1005X04L 53.9,85.5 r270 top
R42 "5k1" RES_0603 59.775,51.85 r180 top
R43 "5k1" RES_0603 59.775,53.65 r180 top
R44 "5k1" RES_0603 75.8,53.65 r180 top
R45 "5k1" RES_0603 75.8,51.85 r180 top
R46 "120R" RES_0603 58.75,83.575 r270 top
R47 "1k" RES_0603 66.075,75.1 r90 top
R48 "10k" RESC1005X04L 37.225,71.65 r180 top value=0R
R52 "120R" RESC1005X04L 37.6,73.575 r90 top value=0R
R53 "1M" RES_0603 34.65,81.55 r90 top
R54 "10k" RES_0603 54.8,81.925 r0 top
R55 "10k" RES_0603 51.675,81.919 r180 top
R56 "10k" RES_0603 48.775,78.975 r180 top
SB1 "Solderbridge" Solderbridge_Shorted 111.475,68.2 r270 top net-tie
SB2 "Solderbridge" Solderbridge 33.075,59.175 r270 top
SB3 "Solderbridge" Solderbridge 53.975,80.2 r270 top
SB4 "Solderbridge" Solderbridge 52.475,80.2 r270 top
STS1 "RED" LED_0603_RED 97.025,93.025 r270 top
TP1 "Ø1.0mm,SMD" TP_SMD_D1.0mm 37.45,57.7 r90 top
TP2 "Ø1.0mm,SMD" TP_SMD_D1.0mm 51.1,72.625 r90 top
TP5 "Ø1.0mm,SMD" TP_SMD_D1.0mm 60.075,64 r0 top
TP6 "Ø1.0mm,SMD" TP_SMD_D1.0mm 64.375,61.025 r90 top
TP9 "Ø1.0mm,SMD" TP_SMD_D1.0mm 75.05,79.025 r90 top
TP10 "Ø1.0mm,SMD" TP_SMD_D1.0mm 50.35,51.875 r90 top
TP11 "Ø1.0mm,SMD" TP_SMD_D1.0mm 67.075,51.875 r90 top
TP14 "Ø1.5mm,SMD" TP_SMD_D1.5mm 30.45,54.975 r90 top
U1 "TPS54331DR" SOIC127P599X175-8N 44.75,58.65 r0 top
U2 "TPS63020DSJT" IC_TPS63020DSJT 59.075,72.475 r90 top
U3 "TLV75733PDBVR" SOT95P280X145-5N 59.399,58.65 r0 top
U4 "EC200UEUAA-N05-SGNSA" XCVR_EC200UCNAA-N05-SGNSA 93.625,75.7 r0 top locked
U5 "TXS0108EPWR" SOP65P640X120-20N 94.55,96.125 r90 bottom
U6 "SKY65943-11" SKY65943-11 114.488,65.994 r0 top locked
U7 "TCAN1051HGVDR" SOIC-8 42.3,73.578 r180 top
U8 "LSM6DSOTR" LSM6DSOTR 53.325,77.725 r0 top
U9 "HOLYIOT-18010-NRF52840" XCVR_HOLYIOT-18010-NRF52840 67.375,93.125 r0 top locked
U10 "MCP2515-I/ML" QFN50P400X400X100-21N 44.725,80.525 r270 top
uart_debug "TSW-104-08-T-S-LL" SAMTEC_TSW-104-08-T-S-LL 37.96,43.775 r0 top
usb_boot "EVQQ2W03W" EVQQ2W03W 70.275,62.4 r0 top
Y1 "C3E-8.000-18-3030" XTAL_C3E-8.000-18-3030-X-R 39.4,80.625 r180 top

## Footprints (in the part's own frame and the unit in brackets; to place one, negate y for a bottom-side part, rotate by r counter-clockwise, add the part's x,y. Pads: shape width x height; smd on the part's side, far side on the other; paste and mask are expansions set on the pad)
ASPI-0630HI-6R8M-T15 [mm]
  rect 2.35x3.4 smd: 1(-3.025,0) 2(3.025,0)
  body extent -3.6,-3.32 3.6,3.32, height 3.01
BOOMELE_PJ-320B [mm]
  rect 1.5x3.5 smd: 1(-2.9,-3.75) 2(-0.9,3.75) 3(4.1,-3.75)
  round 1.2 hole 1.2 unplated: ""(-3,0) ""(3,0)
  silkscreen extent -6.95,-6.6 6,3, body extent -7.67,-5.38 6.33,5.12, height 5
CAP_0402 [mm]
  rrect25% 0.6x0.7 smd: 1(-0.5,0) 2(0.5,0)
  body extent -0.5,-0.26 0.5,0.26, height 0.37
CAP_0603 [mm]
  rrect25% 0.8x1 smd: 1(-0.75,0) 2(0.75,0)
  silkscreen extent -1.4,-0.74 1.39,0.74, body extent -0.8,-0.4 0.8,0.4, height 0.51
CAP_0805 [mm]
  rrect25% 1.4x1.7 smd: 1(-1.143,0) 2(1.143,0)
  body extent -1.15,-0.76 1.15,0.79, height 1.01
CAP_1206 [mm]
  rrect25% 1x1.8 smd: 1(-1.55,0) 2(1.55,0)
  body extent -1.6,-0.8 1.6,0.8, height 0.94
CAP_EEEHA0J101WR [mm]
  rect 2.8x1.6 smd: 1(-2.15,0) 2(2.15,0)
  silkscreen extent -4.25,-2.65 2.65,2.65, body extent -3,-2.65 3,2.65, height 5.8
CAPC0603X03L_C [mm]
  rect 0.27x0.3 smd mask+0.05: 1(-0.285,0) 2(0.285,0)
  body extent -0.3,-0.15 0.31,0.15, height 0.3
CAPC0603X03L_C_NC [mm]
  rect 0.27x0.3 smd mask+0.05: 1(-0.285,0) 2(0.285,0)
  silkscreen extent -0.49,-0.22 0.49,0.22
CAPC1005X04L [mm]
  rect 0.6x0.5 smd: 1(-0.5,0) 2(0.5,0)
  silkscreen extent -0.9,-0.35 0.9,0.35, body extent -0.51,-0.25 0.51,0.25, height 0.5
CAPC1005X04L_NC [mm]
  rect 0.6x0.5 smd: 1(-0.5,0) 2(0.5,0)
  silkscreen extent -0.9,-0.35 0.9,0.35
"COAXIAL RF U.FL-R-SMT-1" [mm]
  rect 1x1.05 smd: 1(0,-1.525)
  rect 1.05x2.2 smd: 2(-1.475,0) 2(1.475,0)
  Sig/Pwr/Gnd-1 pour cut-out: 0.85,1.3 -0.85,1.3 -0.85,-1.525 0.85,-1.525
  silkscreen extent -1.32,-1.3 1.28,1.3, body extent -1.5,-1.6 1.5,1.5, height 1.25
COAXIAL-SWF [mm]
  rect 0.5x0.58 smd: 1(0,1.16) 3(0,-1.16)
  rect 0.75x0.8 smd: 2(-1.025,0.95) 2(-1.025,-0.95) 2(1.025,0.95) 2(1.025,-0.95)
  Sig/Pwr/Gnd-1 pour cut-out: 0.65,-0.55 -0.65,-0.55 -0.65,-1.35 0.65,-1.35
  Sig/Pwr/Gnd-1 pour cut-out: -0.65,0.55 0.65,0.55 0.65,1.35 -0.65,1.35
  silkscreen extent -1.25,-1.25 1.25,1.25, body extent -1.26,-1.3 1.26,1.3, height 1.55
COMTECH_C-OBD-II-16M [mm]
  rect 2.5x2.5 / inner round 2.5 / far side rect 2.5x2.5 hole 1.5: 1(0,0)
  round 2.5 hole 1.5: 2(4,0) 3(8,0) 4(12,0) 5(16,0) 6(20,0) 7(24,0) 8(28,0) 9(0,3) 10(4,3) 11(8,3) 12(12,3) 13(16,3) 14(20,3) 15(24,3) 16(28,3)
  silkscreen extent -2.1,-0.1 -1.9,0.1, body extent -6.65,-22.75 34.65,3.4, height 16.1
DFN65P100X40-3L [mm]
  rect 0.4x0.25 smd mask+0.05: 1(-0.35,0.225) 2(-0.35,-0.225)
  rect 0.4x0.7 smd mask+0.065: 3(0.35,0)
  silkscreen extent -0.58,0.58 -0.48,0.67, body extent -0.53,-0.32 0.53,0.32, height 0.4
DIOM5226X100N [mm]
  rect 1.89x1.38 smd: A(2.24,0) K(-2.24,0)
  silkscreen extent -3.91,-0.1 -3.71,0.1, body extent -2.4,-1.15 2.3,1.35, height 1.1
DSGP.1575.18.4.C.02 [mm]
  rect 2x2.5 smd paste-0.25 mask+0.3: 1(0,-8.55)
  rect 3.5x3.5 smd paste-0.6 mask+0.1: 2(-6.75,6.75) 2(-6.75,0) 2(-6.75,-6.75) 2(0,6.75) 2(0,0) 2(6.75,6.75) 2(6.75,0) 2(6.75,-6.75)
  Keep-Out Layer lines w0.01: 1.26,-10.14 1.84,-10.14 1.84,-6.96 -1.84,-6.96 -1.84,-10.14 -1.26,-10.14
  Multi-Layer pour cut-out: -2,-6.8 -2,-10.3 2,-10.3 2,-6.8
  silkscreen extent -9,-9 9,9, body extent -9,-9.01 9,9, height 4.02
EVQQ2W03W [mm]
  rect 1x2.8 smd: 1(-2,-3.4) 2(-2,3.4) 3(2,-3.4) 4(2,3.4)
  silkscreen extent -3,-3.62 3,3.6, body extent -2.97,-3.35 3.03,3.25, height 3.1
FB_0603 [mm]
  rrect25% 0.8x1 smd: 1(-0.75,0) 2(0.75,0)
  body extent -0.8,-0.4 0.8,0.4, height 0.81
IC_TPS63020DSJT [mm]
  oval 0.6x0.24 smd mask+0: 1(-1.4,1.5) 2(-1.4,1) 3(-1.4,0.5) 4(-1.4,0) 5(-1.4,-0.5) 6(-1.4,-1) 7(-1.4,-1.5) 8(1.4,-1.5) 9(1.4,-1) 10(1.4,-0.5) 11(1.4,0) 12(1.4,0.5) 13(1.4,1) 14(1.4,1.5)
  rect 1.5x2.8 smd paste-2 mask+0: 15(0,0)
  round 0.3 hole 0.2: 16(-0.5,1) 17(0,1) 18(0.5,1) 19(-0.5,0.5) 20(0,0.5) 21(0.5,0.5) 22(-0.5,0) 23(0,0) 24(0.5,0) 25(-0.5,-0.5) 26(0,-0.5) 27(0.5,-0.5) 28(-0.5,-1) 29(0,-1) 30(0.5,-1)
  Sig/Pwr/Gnd-1 region: 0.79,-2.2 0.59,-2.2 0.59,-1.425 0.33,-1.425 0.33,-2.2 0.13,-2.2 0.13,-1.425 -0.13,-1.425 -0.13,-2.2 -0.33,-2.2 -0.33,-1.425 -0.59,-1.425 -0.59,-2.2 -0.79,-2.2 -0.79,2.2 -0.59,2.2 -0.59,1.425 -0.33,1.425 -0.33,2.2 -0.13,2.2 -0.13,1.425 0.13,1.425 0.13,2.2 0.33,2.2 0.33,1.425 0.59,1.425 0.59,2.2 0.79,2.2
  silkscreen extent -2.3,-2 1.5,2, body extent -1.5,-2 1.5,2, height 1
IND_1008 [mm]
  rrect25% 1.3x2.54 smd: 1(-1.25,0) 2(1.25,0)
  body extent -1.3,-1.05 1.3,1.05, height 1.71
INDC0603X03L_C [mm]
  rect 0.27x0.3 smd: 1(-0.285,0) 2(0.285,0)
  silkscreen extent -0.49,-0.22 0.49,0.22, body extent -0.31,-0.16 0.31,0.16, height 0.26
INDC1005X04L_NC [mm]
  rect 0.65x0.5 smd: 1(-0.475,0) 2(0.475,0)
  silkscreen extent -0.9,-0.35 0.9,0.35
INDC1005X04L_WW [mm]
  rect 0.65x0.5 smd: 1(-0.475,0) 2(0.475,0)
  silkscreen extent -0.9,-0.35 0.9,0.35, body extent -0.5,-0.3 0.5,0.3, height 0.51
KLS1-SIM-066 [mm]
  rect 0.7x2.1 smd: 0(-1.67,-1.55) 0(-1.67,-13.55) 0(11.32,-1.55) 0(11.32,-13.55)
  rect 0.75x1.2 smd: C1(5.08,0) C2(2.54,0) C3(0,0) C5(6.35,0) C6(3.81,0) C7(1.27,0)
  rect 0.65x1.2 smd: CD(7.3,0)
  round 0.75 hole 0.75 unplated: ""(-0.17,-12.3) ""(8.33,-12.3)
  Sig/Pwr/Gnd-1 keep-out region: 1.75,-6.5 0.55,-6.5 0.55,-2.7 1.75,-2.7
  Sig/Pwr/Gnd-1 keep-out region: 4.29,-6.5 3.09,-6.5 3.09,-2.7 4.29,-2.7
  Sig/Pwr/Gnd-1 keep-out region: 6.83,-6.5 5.63,-6.5 5.63,-2.7 6.83,-2.7
  Sig/Pwr/Gnd-1 keep-out region: 1.75,-13.4 0.55,-13.4 0.55,-9.6 1.75,-9.6
  Sig/Pwr/Gnd-1 keep-out region: 4.29,-13.4 3.09,-13.4 3.09,-9.6 4.29,-9.6
  Sig/Pwr/Gnd-1 keep-out region: 6.83,-13.4 5.63,-13.4 5.63,-9.6 6.83,-9.6
  silkscreen extent -1.38,-14.3 11.02,-0.7, body extent -1.72,-14.49 11.37,0.09, height 1.44
LED_0603_BLUE [mm]
  rrect25% 0.8x1 smd: A(0.75,0) K(-0.75,0)
  silkscreen extent -1.5,-0.8 -0.8,0.8, body extent -0.8,-0.4 0.8,0.4, height 0.6
LED_0603_RED [mm]
  rrect25% 0.8x1 smd: A(0.75,0) K(-0.75,0)
  silkscreen extent -1.5,-0.8 -0.8,0.8, body extent -0.8,-0.4 0.8,0.4, height 0.6
LSM6DSOTR [mm]
  rect 0.9x0.3 smd paste-1: 1(-1.4,0.75) 2(-1.4,0.25) 3(-1.4,-0.25) 4(-1.4,-0.75) 8(1.4,-0.75) 9(1.4,-0.25) 10(1.4,0.25) 11(1.4,0.75)
  rect 0.3x0.9 smd paste-1 mask+0: 5(-0.5,-1.15) 6(0,-1.15) 7(0.5,-1.15) 12(0.5,1.15) 13(0,1.15) 14(-0.5,1.15)
  Keep-Out Layer region: 0.7,-0.4 0.3,-0.4 0.3,0.4 0.7,0.4
  Keep-Out Layer region: -0.3,-0.4 -0.7,-0.4 -0.7,0.4 -0.3,0.4
  silkscreen extent -2.05,1.3 -1.65,1.7, body extent -1.5,-1.25 1.5,1.25, height 0.86
MOLEX_5025700893 [mm]
  rect 0.8x1.5 smd: 1(-2.7,4.2) 2(-1.6,4.2) 3(-0.5,4.2) 4(0.6,4.2) 5(1.7,4.2) 6(2.8,4.2) 7(3.9,4.2) 8(5,4.2)
  rect 1.15x1.5 smd: 9(6.575,-2.65)
  rect 1.5x1.15 smd: 10(-0.6,-7.375) P$3(-2.9,-7.375) P$5(6,-7.375)
  rect 1.4x1.7 smd: P$1(-6.45,7.1) P$2(6.45,7.1)
  Keep-Out Layer region: 1.35,-7.514 0.351,-7.514 0.351,-7 1.35,-7
  Keep-Out Layer region: 1.35,-7.513 0.351,-7.513 0.351,-7 1.35,-7
  Keep-Out Layer region: 6.9,-6.609 4.005,-6.609 4.005,-5.2 6.9,-5.2
  Keep-Out Layer region: 6.7,-1.703 6.21,-1.703 6.21,-0.7 6.7,-0.7
  Keep-Out Layer region: 6.7,-1.701 6.205,-1.701 6.205,-0.7 6.7,-0.7
  Keep-Out Layer region: 6.9,-6.604 4.002,-6.604 4.002,-5.2 6.9,-5.2
  silkscreen extent -6.9,-7.75 5.4,7.75, body extent -6.98,-7.75 6.83,7.75, height 0.9
P822601 [mm]
  rect 2x2 smd: 1(-8.89,-2.286) 2(-5.08,-2.286)
  rect 0.5x0.6 smd: 3(-8.7,-8.3) 4(-8.7,-10.6)
  Sig/Pwr/Gnd-1 region: -10.45,-11.296 -24.65,-11.296 -24.65,-7.996 -10.45,-7.996
  Sig/Pwr/Gnd-1 region: 24.75,-11.296 -8.05,-11.296 -8.05,-8.001 24.75,-8.001
  Sig/Pwr/Gnd-1 region: -8.45,-10.496 -8.95,-10.496 -8.95,-10.296 -8.45,-10.296
  Sig/Pwr/Gnd-1 region: -9.45,-10.496 -9.95,-10.496 -9.95,-10.296 -9.45,-10.296
  Sig/Pwr/Gnd-1 region: -8.45,-10.696 -9.95,-10.696 -9.95,-10.496 -8.45,-10.496
  Sig/Pwr/Gnd-1 region: -8.45,-10.896 -8.95,-10.896 -8.95,-10.696 -8.45,-10.696
  Sig/Pwr/Gnd-1 region: -9.45,-10.896 -9.95,-10.896 -9.95,-10.696 -9.45,-10.696
  Sig/Pwr/Gnd-1 region: -9.6,-11.296 -9.8,-11.296 -9.8,-10.896 -9.6,-10.896
  Sig/Pwr/Gnd-1 region: -7.3,-3.796 -10.4,-3.796 -10.4,-0.596 -7.3,-0.596
  Sig/Pwr/Gnd-1 region: -8.2,-5.696 -9.2,-5.696 -9.2,-3.796 -8.2,-3.796
  Sig/Pwr/Gnd-1 region: -8.6,-6.896 -8.8,-6.896 -8.8,-5.696 -8.6,-5.696
  Sig/Pwr/Gnd-1 region: -8.45,-7.096 -8.95,-7.096 -8.95,-6.896 -8.45,-6.896
  Sig/Pwr/Gnd-1 region: -9.45,-7.096 -9.95,-7.096 -9.95,-6.896 -9.45,-6.896
  Sig/Pwr/Gnd-1 region: -8.45,-7.296 -9.95,-7.296 -9.95,-7.096 -8.45,-7.096
  Sig/Pwr/Gnd-1 region: -8.45,-7.496 -8.95,-7.496 -8.95,-7.296 -8.45,-7.296
  Sig/Pwr/Gnd-1 region: -9.45,-7.496 -9.95,-7.496 -9.95,-7.296 -9.45,-7.296
  Sig/Pwr/Gnd-1 region: -9.2,-6.496 -12.45,-6.496 -12.45,-5.996 -9.2,-5.996
  Sig/Pwr/Gnd-1 region: -10.45,-7.996 -12.45,-7.996 -12.45,-6.496 -10.45,-6.496
  Sig/Pwr/Gnd-1 region: -3.67,-3.826 -6.399,-3.826 -6.4,-0.566 -3.67,-0.566
  Sig/Pwr/Gnd-1 region: -3.67,-5.996 -5.71,-5.996 -5.71,-3.826 -3.67,-3.826
  Sig/Pwr/Gnd-1 region: -3.67,-7.991 -8.05,-7.991 -8.05,-5.996 -3.67,-5.996
  Sig/Pwr/Gnd-1 region: 24.6,-2.046 21.7,-2.046 21.7,3.754 24.6,3.754
  Sig/Pwr/Gnd-1 region: 24.6,-5.796 12.05,-5.796 12.05,-2.046 24.6,-2.046
  Sig/Pwr/Gnd-1 region: -21.6,-3.746 -24.5,-3.746 -24.5,-1.246 -21.6,-1.246
  Sig/Pwr/Gnd-1 region: -22.4,-0.846 -24.5,-0.846 -24.5,0.854 -22.4,0.854
  Sig/Pwr/Gnd-1 region: -21.6,1.254 -24.5,1.254 -24.5,3.754 -21.6,3.754
  Sig/Pwr/Gnd-1 region: -9.45,-9.796 -9.95,-9.796 -9.95,-9.596 -9.45,-9.596
  Sig/Pwr/Gnd-1 region: -8.45,-9.796 -8.95,-9.796 -8.95,-9.596 -8.45,-9.596
  Sig/Pwr/Gnd-1 region: -8.45,-9.596 -9.95,-9.596 -9.95,-9.396 -8.45,-9.396
  Sig/Pwr/Gnd-1 region: -9.45,-9.396 -9.95,-9.396 -9.95,-9.196 -9.45,-9.196
  Sig/Pwr/Gnd-1 region: -8.45,-9.396 -8.95,-9.396 -8.95,-9.196 -8.45,-9.196
  Sig/Pwr/Gnd-1 region: -9.6,-9.196 -9.8,-9.196 -9.8,-8.596 -9.6,-8.596
  Sig/Pwr/Gnd-1 region: -9.45,-8.596 -9.95,-8.596 -9.95,-8.396 -9.45,-8.396
  Sig/Pwr/Gnd-1 region: -8.45,-8.596 -8.95,-8.596 -8.95,-8.396 -8.45,-8.396
  Sig/Pwr/Gnd-1 region: -8.45,-8.396 -9.95,-8.396 -9.95,-8.196 -8.45,-8.196
  Sig/Pwr/Gnd-1 region: -9.45,-8.196 -9.95,-8.196 -9.95,-7.996 -9.45,-7.996
  Sig/Pwr/Gnd-1 region: -8.45,-8.196 -8.95,-8.196 -8.95,-7.996 -8.45,-7.996
  Sig/Pwr-6 region: 24.752,-11.296 -24.648,-11.296 -24.65,-7.996 24.75,-7.996
  Sig/Pwr-6 region: -3.86,-7.996 -12.45,-7.996 -12.45,-5.996 -3.86,-5.996
  Sig/Pwr-6 region: 4.7,-5.796 3.7,-5.796 3.7,-3.746 4.7,-3.746
  Sig/Pwr-6 region: 6.2,-5.796 5.2,-5.796 5.2,-3.746 6.2,-3.746
  Sig/Pwr-6 region: 13.2,-4.596 11.2,-4.596 11.2,-3.746 13.2,-3.746
  Sig/Pwr-6 region: 10.7,-4.596 9.7,-4.596 9.7,-3.746 10.7,-3.746
  Sig/Pwr-6 region: 9.2,-4.596 8.2,-4.596 8.2,-3.746 9.2,-3.746
  Sig/Pwr-6 region: 7.7,-4.596 6.7,-4.596 6.7,-3.746 7.7,-3.746
  Sig/Pwr-6 region: 13.2,-4.896 6.7,-4.896 6.7,-4.596 13.2,-4.596
  Sig/Pwr-6 region: 13.2,-5.796 11.2,-5.796 11.2,-4.896 13.2,-4.896
  Sig/Pwr-6 region: 10.7,-5.796 9.7,-5.796 9.7,-4.896 10.7,-4.896
  Sig/Pwr-6 region: 9.2,-5.796 8.2,-5.796 8.2,-4.896 9.2,-4.896
  Sig/Pwr-6 region: 7.7,-5.796 6.7,-5.796 6.7,-4.896 7.7,-4.896
  Sig/Pwr-6 region: -22.5,-5.046 -24.5,-5.046 -24.5,-4.046 -22.5,-4.046
  Sig/Pwr-6 region: -21,-3.546 -22,-3.546 -22,-1.046 -21,-1.046
  Sig/Pwr-6 region: -22.5,-0.546 -24.5,-0.546 -24.5,3.754 -22.5,3.754
  Sig/Pwr-6 region: -22.5,-1.046 -22.8,-1.046 -22.8,-0.546 -22.5,-0.546
  Sig/Pwr-6 region: -22.5,-2.046 -24.5,-2.046 -24.5,-1.046 -22.5,-1.046
  Sig/Pwr-6 region: -24.196,-2.546 -24.5,-2.546 -24.5,-2.046 -24.196,-2.046
  Sig/Pwr-6 region: -22.5,-3.546 -24.5,-3.546 -24.5,-2.546 -22.5,-2.546
  Multi-Layer pour cut-out: -39.95,5.08 39.05,5.08 39.05,-7.996 -39.95,-7.996
  silkscreen extent -25.2,-4.25 25.3,4.05, body extent -24.95,-4 25.05,4, height 3.2
QFN50P400X400X100-21N [mm]
  rrect25% 0.84x0.26 smd: 1(-1.935,1) 2(-1.935,0.5) 3(-1.935,0) 4(-1.935,-0.5) 5(-1.935,-1) 11(1.935,-1) 12(1.935,-0.5) 13(1.935,0) 14(1.935,0.5) 15(1.935,1)
  rrect25% 0.26x0.84 smd: 6(-1,-1.935) 7(-0.5,-1.935) 8(0,-1.935) 9(0.5,-1.935) 10(1,-1.935) 16(1,1.935) 17(0.5,1.935) 18(0,1.935) 19(-0.5,1.935) 20(-1,1.935)
  rect 2.7x2.7 smd paste-0.5: 21(0,0)
  round 0.6 hole 0.3 mask+0: 22(-1,1) 23(0,1) 24(1,1) 25(-1,0) 26(0,0) 27(1,0) 28(-1,-1) 29(0,-1) 30(1,-1)
  silkscreen extent -3.07,-2 2,2, body extent -2,-2 2,2, height 1
RES_0603 [mm]
  rrect25% 0.8x1 smd: 1(-0.75,0) 2(0.75,0)
  silkscreen extent -1.4,-0.75 1.39,0.74, body extent -0.8,-0.43 0.8,0.43, height 0.52
RES_0805 [mm]
  rrect25% 1x1.7 smd: 1(-0.95,0) 2(0.95,0)
  body extent -1,-0.63 1,0.63, height 0.47
RESC1005X04L [mm]
  rect 0.6x0.55 smd mask+0.05: 1(-0.5,0) 2(0.5,0)
  silkscreen extent -0.87,-0.38 0.88,0.38, body extent -0.5,-0.25 0.5,0.25, height 0.3
SAMTEC_TSW-104-08-T-S-LL [mm]
  rect 1.37x1.37 hole 1.02: 01(0,0)
  round 1.37 hole 1.02: 02(2.54,0) 03(5.08,0) 04(7.62,0)
  silkscreen extent -2.02,-1.27 8.89,1.27
SKY65943-11 [mm]
  rect 0.425x0.515 smd mask+0.05: 1(-1.188,1.144) 5(-1.188,-1.144) 6(1.188,-1.144) 10(1.188,1.144)
  rect 0.425x0.275 smd mask+0.05: 2(-1.188,0.5) 3(-1.188,0) 4(-1.188,-0.5) 7(1.188,-0.5) 8(1.188,0) 9(1.188,0.5)
  rect 1.45x2.802 smd paste-2 mask-5: 11(0,0)
  rect 1.55x2.487 on Top Solder: ""(0,0)
  Sig/Pwr/Gnd-1 region: -0.712,-0.362 -0.987,-0.362 -0.987,-0.637 -0.712,-0.637
  Sig/Pwr/Gnd-1 region: 0.712,0.363 0.987,0.363 0.987,0.637 0.712,0.637
  Sig/Pwr/Gnd-1 region: 0.712,-1.4 0.987,-1.4 0.987,-0.887 0.712,-0.887
  Sig/Pwr/Gnd-1 region: -0.988,0.887 -0.713,0.887 -0.713,1.4 -0.988,1.4
  silkscreen extent -1.65,-1.3 1.3,1.65, body extent -1.25,-1.25 1.25,1.25, height 0.71
SOIC127P599X175-8N [mm]
  rrect25% 1.97x0.6 smd: 1(-2.47,1.905) 2(-2.47,0.635) 3(-2.47,-0.635) 4(-2.47,-1.905) 5(2.47,-1.905) 6(2.47,-0.635) 7(2.47,0.635) 8(2.47,1.905)
  silkscreen extent -4.14,-2.52 1.95,2.52, body extent -3,-2.45 3,2.45, height 1.75
SOIC-8 [mm] "SOIC, 8-Leads, Body 4.91x3.90mm, Pitch 1.27mm, IPC Medium Density"
  rrect25% 1.45x0.6 smd: 1(-2.725,1.905) 2(-2.725,0.635) 3(-2.725,-0.635) 4(-2.725,-1.905) 5(2.725,-1.905) 6(2.725,-0.635) 7(2.725,0.635) 8(2.725,1.905)
  silkscreen extent -2.85,-2.3 1.6,2.88, body extent -3,-2.5 3,2.5, height 1.75
Solderbridge [mil]
  round 1 smd paste+0: 1(-13.78,0) 2(13.78,0)
  Sig/Pwr/Gnd-1 region: 7.49,-19.36 15.76,-15.74 21.55,-8.8 23.62,0 23.62,0 21.55,8.79 15.76,15.74 7.49,19.36 7.49,19.36 6.18,19.31 5.02,18.71 4.22,17.68 3.94,16.4 3.94,16.4 3.94,-16.4 4.22,-17.68 5.02,-18.71 6.18,-19.31 7.49,-19.36
  Sig/Pwr/Gnd-1 region: -7.49,19.36 -15.76,15.74 -21.55,8.8 -23.62,0 -23.62,0 -21.55,-8.79 -15.76,-15.74 -7.49,-19.36 -7.49,-19.36 -6.18,-19.31 -5.02,-18.71 -4.22,-17.68 -3.94,-16.4 -3.94,-16.4 -3.94,16.4 -4.22,17.68 -5.02,18.71 -6.18,19.31 -7.49,19.36
Solderbridge_Shorted [mil]
  round 1 smd paste+0: 1(-13.78,0) 2(13.78,0)
  Sig/Pwr/Gnd-1 region: -4.92,3.94 -4.92,-3.94 4.92,-3.94 4.92,3.94
  Sig/Pwr/Gnd-1 region: 7.49,-19.36 15.76,-15.74 21.55,-8.8 23.62,0 23.62,0 21.55,8.79 15.76,15.74 7.49,19.36 7.49,19.36 6.18,19.31 5.02,18.71 4.22,17.68 3.94,16.4 3.94,16.4 3.94,-16.4 4.22,-17.68 5.02,-18.71 6.18,-19.31 7.49,-19.36
  Sig/Pwr/Gnd-1 region: -7.49,19.36 -15.76,15.74 -21.55,8.8 -23.62,0 -23.62,0 -21.55,-8.79 -15.76,-15.74 -7.49,-19.36 -7.49,-19.36 -6.18,-19.31 -5.02,-18.71 -4.22,-17.68 -3.94,-16.4 -3.94,-16.4 -3.94,16.4 -4.22,17.68 -5.02,18.71 -6.18,19.31 -7.49,19.36
SOP65P640X120-20N [mm]
  rrect25% 1.57x0.41 smd: 1(-2.87,2.925) 2(-2.87,2.275) 3(-2.87,1.625) 4(-2.87,0.975) 5(-2.87,0.325) 6(-2.87,-0.325) 7(-2.87,-0.975) 8(-2.87,-1.625) 9(-2.87,-2.275) 10(-2.87,-2.925) 11(2.87,-2.925) 12(2.87,-2.275) 13(2.87,-1.625) 14(2.87,-0.975) 15(2.87,-0.325) 16(2.87,0.325) 17(2.87,0.975) 18(2.87,1.625) 19(2.87,2.275) 20(2.87,2.925)
  silkscreen extent -4.29,-3.45 2.2,3.45, body extent -3.2,-3.25 3.2,3.25, height 1.2
SOT65P210X110-6N [mm]
  rect 1.17x0.4 smd: 1(-0.87,0.65) 2(-0.87,0) 3(-0.87,-0.65) 4(0.87,-0.65) 5(0.87,0) 6(0.87,0.65)
  silkscreen extent -2.11,0.61 -1.91,0.81, body extent -1.05,-1.07 1.05,1.07, height 1.1
SOT95P230X110-3N [mm]
  rrect50% 1.26x0.61 smd: B(-0.98,0.95) C(0.98,0) E(-0.98,-0.95)
  silkscreen extent -2.03,-1.53 0.7,1.53, body extent -1.32,-1.52 1.32,1.52, height 0.94
SOT95P280X145-5N [mm]
  rrect50% 1.21x0.59 smd: 1(-1.255,0.95) 2(-1.255,0) 3(-1.255,-0.95) 4(1.255,-0.95) 5(1.255,0.95)
  silkscreen extent -2.51,-1.45 0.8,1.45, body extent -1.4,-1.45 1.4,1.45, height 1.45
TC2050-IDC-NLFP [mil]
  round 39 hole 39 unplated: 0(-150,0) 0(150,-40) 0(150,40)
  round 31 smd paste-196.85: 1(-100,-25) 2(-50,-25) 3(0,-25) 4(50,-25) 5(100,-25) 6(100,25) 7(50,25) 8(0,25) 9(-50,25) 10(-100,25)
  Sig/Pwr/Gnd-1 pour cut-out: -100,25 -100,-25 100,-25 100,25
TP_SMD_D1.0mm [mm]
  round 1 smd paste-5: 1(0,0)
  silkscreen extent -0.76,-0.76 0.76,0.76
TP_SMD_D1.5mm [mm]
  round 1.5 smd paste-5: 1(0,0)
  body extent -0.75,-0.75 0.75,0.75, height 0.05
TYPE-C-31-M-12 [mm]
  rect 0.6x1.5 smd mask+0.07: A1B12(-3.2,2.85) B1A12(3.2,2.85)
  rect 0.6x1.5 smd mask+0.14: A4B9(-2.4,2.85) B4A9(2.4,2.85)
  rect 0.3x1.5 smd mask+0.14: A5(-1.25,2.85) A6(-0.25,2.85) A7(0.25,2.85) A8(1.25,2.85) B5(1.75,2.85) B6(0.75,2.85) B7(-0.75,2.85) B8(-1.75,2.85)
  round 0.6 hole 0.6 unplated mask+0.3: MH(-2.9,1.6) MH(2.9,1.6)
  oval 1x1.9 hole 0.55 slot 1.45 at 90 deg mask+0.05: SH(-4.325,-2.1) SH(4.325,-2.1)
  oval 1x2.2 hole 0.55 slot 1.75 at 90 deg mask+0.05: SH(-4.325,2.1) SH(4.325,2.1)
  body extent -4.47,-4.65 4.47,3.25, height 3.32
XCVR_EC200UCNAA-N05-SGNSA [mm]
  oval 2.5x0.8 smd: 1(-15.75,12.6) 2(-15.75,11.3) 3(-15.75,10) 4(-15.75,8.7) 5(-15.75,7.4) 6(-15.75,6.1) 7(-15.75,4.8) 8(-15.75,0.4) 9(-15.75,-0.9) 10(-15.75,-2.2) 11(-15.75,-3.5) 12(-15.75,-4.8) 13(-15.75,-6.1) 14(-15.75,-7.4) 15(-15.75,-8.7) 16(-15.75,-10) 17(-15.75,-11.3) 18(-15.75,-12.6) 37(15.75,-12.6) 38(15.75,-11.3) 39(15.75,-10) 40(15.75,-8.7) 41(15.75,-7.4) 42(15.75,-6.1) 43(15.75,-4.8) 44(15.75,-3.5) 45(15.75,-2.2) 46(15.75,-0.9) 47(15.75,0.4) 48(15.75,4.8) 49(15.75,6.1) 50(15.75,7.4) 51(15.75,8.7) 52(15.75,10) 53(15.75,11.3) 54(15.75,12.6) 141(-15.75,3) 142(-15.75,1.7) 143(15.75,1.7) 144(15.75,3)
  oval 0.8x2.5 smd: 19(-9.55,-14.25) 20(-8.25,-14.25) 21(-6.95,-14.25) 22(-5.65,-14.25) 23(-4.35,-14.25) 24(-3.05,-14.25) 25(-1.75,-14.25) 26(-0.45,-14.25) 27(0.85,-14.25) 28(2.15,-14.25) 29(3.45,-14.25) 30(4.75,-14.25) 31(6.05,-14.25) 32(7.35,-14.25) 33(8.65,-14.25) 34(9.95,-14.25) 35(11.25,-14.25) 36(12.55,-14.25) 55(12.55,14.25) 56(11.25,14.25) 57(9.95,14.25) 58(8.65,14.25) 59(7.35,14.25) 60(6.05,14.25) 61(4.75,14.25) 62(3.45,14.25) 63(2.15,14.25) 64(0.85,14.25) 65(-0.45,14.25) 66(-1.75,14.25) 67(-3.05,14.25) 68(-4.35,14.25) 69(-5.65,14.25) 70(-6.95,14.25) 71(-8.25,14.25) 72(-9.55,14.25) 113(-10.85,14.25) 114(-12.15,14.25) 115(-10.85,-14.25) 116(-12.15,-14.25)
  rect 1.1x1.1 smd: 73(2.4,1.6) 74(2.4,0) 75(2.4,-1.6) 76(0.8,1.6) 77(0.8,0) 78(0.8,-1.6) 79(-0.8,1.6) 80(-0.8,0) 81(-0.8,-1.6) 82(-2.4,1.6) 83(-2.4,0) 84(-2.4,-1.6) 117(-11.2,11) 118(-11.2,9) 119(-11.2,7) 120(-11.2,5) 121(-11.2,3) 122(-11.2,1) 123(-11.2,-1) 124(-11.2,-3) 125(-11.2,-5) 126(-11.2,-7) 127(-11.2,-9) 128(-11.2,-11) 129(-13.2,11) 130(-13.2,9) 131(-13.2,7) 132(-13.2,5) 133(-13.2,3) 134(-13.2,1) 135(-13.2,-1) 136(-13.2,-3) 137(-13.2,-5) 138(-13.2,-7) 139(-13.2,-9) 140(-13.2,-11)
  rect 2x3 smd: 85(8.2,9.6) 86(8.2,4.8) 87(8.2,0) 88(8.2,-4.8) 89(8.2,-9.6) 90(5,9.6) 91(5,4.8) 92(5,0) 93(5,-4.8) 94(5,-9.6) 95(1.6,9.6) 96(1.6,4.8) 97(1.6,-4.8) 98(1.6,-9.6) 99(-1.6,9.6) 100(-1.6,4.8) 101(-1.6,-4.8) 102(-1.6,-9.6) 103(-5,9.6) 104(-5,4.8) 105(-5,0) 106(-5,-4.8) 107(-5,-9.6) 109(-8.2,4.8) 110(-8.2,0) 111(-8.2,-4.8) 112(-8.2,-9.6)
  rect 1x1 smd paste-1 mask+0: 108(-8.2,9.6)
  Sig/Pwr/Gnd-1 region: -7.2,8.1 -9.2,8.1 -9.2,10.3 -8.4,11.1 -7.2,11.1
  silkscreen extent -18.1,-14 15.5,14, body extent -15.5,-14 15.5,14, height 1.93
XCVR_HOLYIOT-18010-NRF52840 [mm]
  rect 1x0.7 smd: 1(-6.35,5.7) 2(-6.35,4.6) 3(-6.35,3.5) 4(-6.35,2.4) 5(-6.35,1.3) 6(-6.35,0.2) 7(-6.35,-0.9) 8(-6.35,-2) 9(-6.35,-3.1) 10(-6.35,-4.2) 11(-6.35,-5.3) 12(-6.35,-6.4) 13(-6.35,-7.5) 25(6.35,-7.5) 26(6.35,-6.4) 27(6.35,-5.3) 28(6.35,-4.2) 29(6.35,-3.1) 30(6.35,-2) 31(6.35,-0.9) 32(6.35,0.2) 33(6.35,1.3) 34(6.35,2.4) 35(6.35,3.5) 36(6.35,4.6) 37(6.35,5.7) 38(-4.25,3.5) 39(-4.25,2.4) 40(-4.25,1.3) 41(-4.25,0.2) 42(-4.25,-0.9) 43(-4.25,-2) 44(-4.25,-3.1) 45(-4.25,-4.2) 46(-4.25,-5.3) 47(4.25,3.5) 48(4.25,2.4) 49(4.25,1.3) 50(4.25,0.2) 51(4.25,-0.9) 52(4.25,-2) 53(4.25,-3.1) 54(4.25,-4.2) 55(4.25,-5.3)
  rect 0.7x1 smd: 14(-5.5,-8.7) 15(-4.4,-8.7) 16(-3.3,-8.7) 17(-2.2,-8.7) 18(-1.1,-8.7) 19(0,-8.7) 20(1.1,-8.7) 21(2.2,-8.7) 22(3.3,-8.7) 23(4.4,-8.7) 24(5.5,-8.7)
  Keep-Out Layer region: 6.8,6.05 -6.8,6.05 -6.8,9 6.8,9
  Keep-Out Layer region: 6.8,6.05 -6.8,6.05 -6.8,9 6.8,9
  silkscreen extent -7.54,-9 6.75,9, body extent -6.75,-9.05 6.75,8.95, height 1.92
XTAL_C3E-8.000-18-3030-X-R [mm]
  rect 1.4x1.2 smd: 1(-1.1,-0.85) 2(1.1,-0.85) 3(1.1,0.85) 4(-1.1,0.85)
  silkscreen extent -2.4,-1.25 0.08,1.25, body extent -1.6,-1.25 1.6,1.25, height 0.75